# Altium PCB PCB-Thermostat.PcbDoc (part 1 of 5)
Units mm, origin at the board's own origin, x right, y up, seen from the top; angles counter-clockwise.
Board outline 100 x 90 mm, 4 copper layers (Top, PWR, GND, Bottom), stack 1.585 mm thick; 187 components, 164 nets, 696 pads, 417 vias.
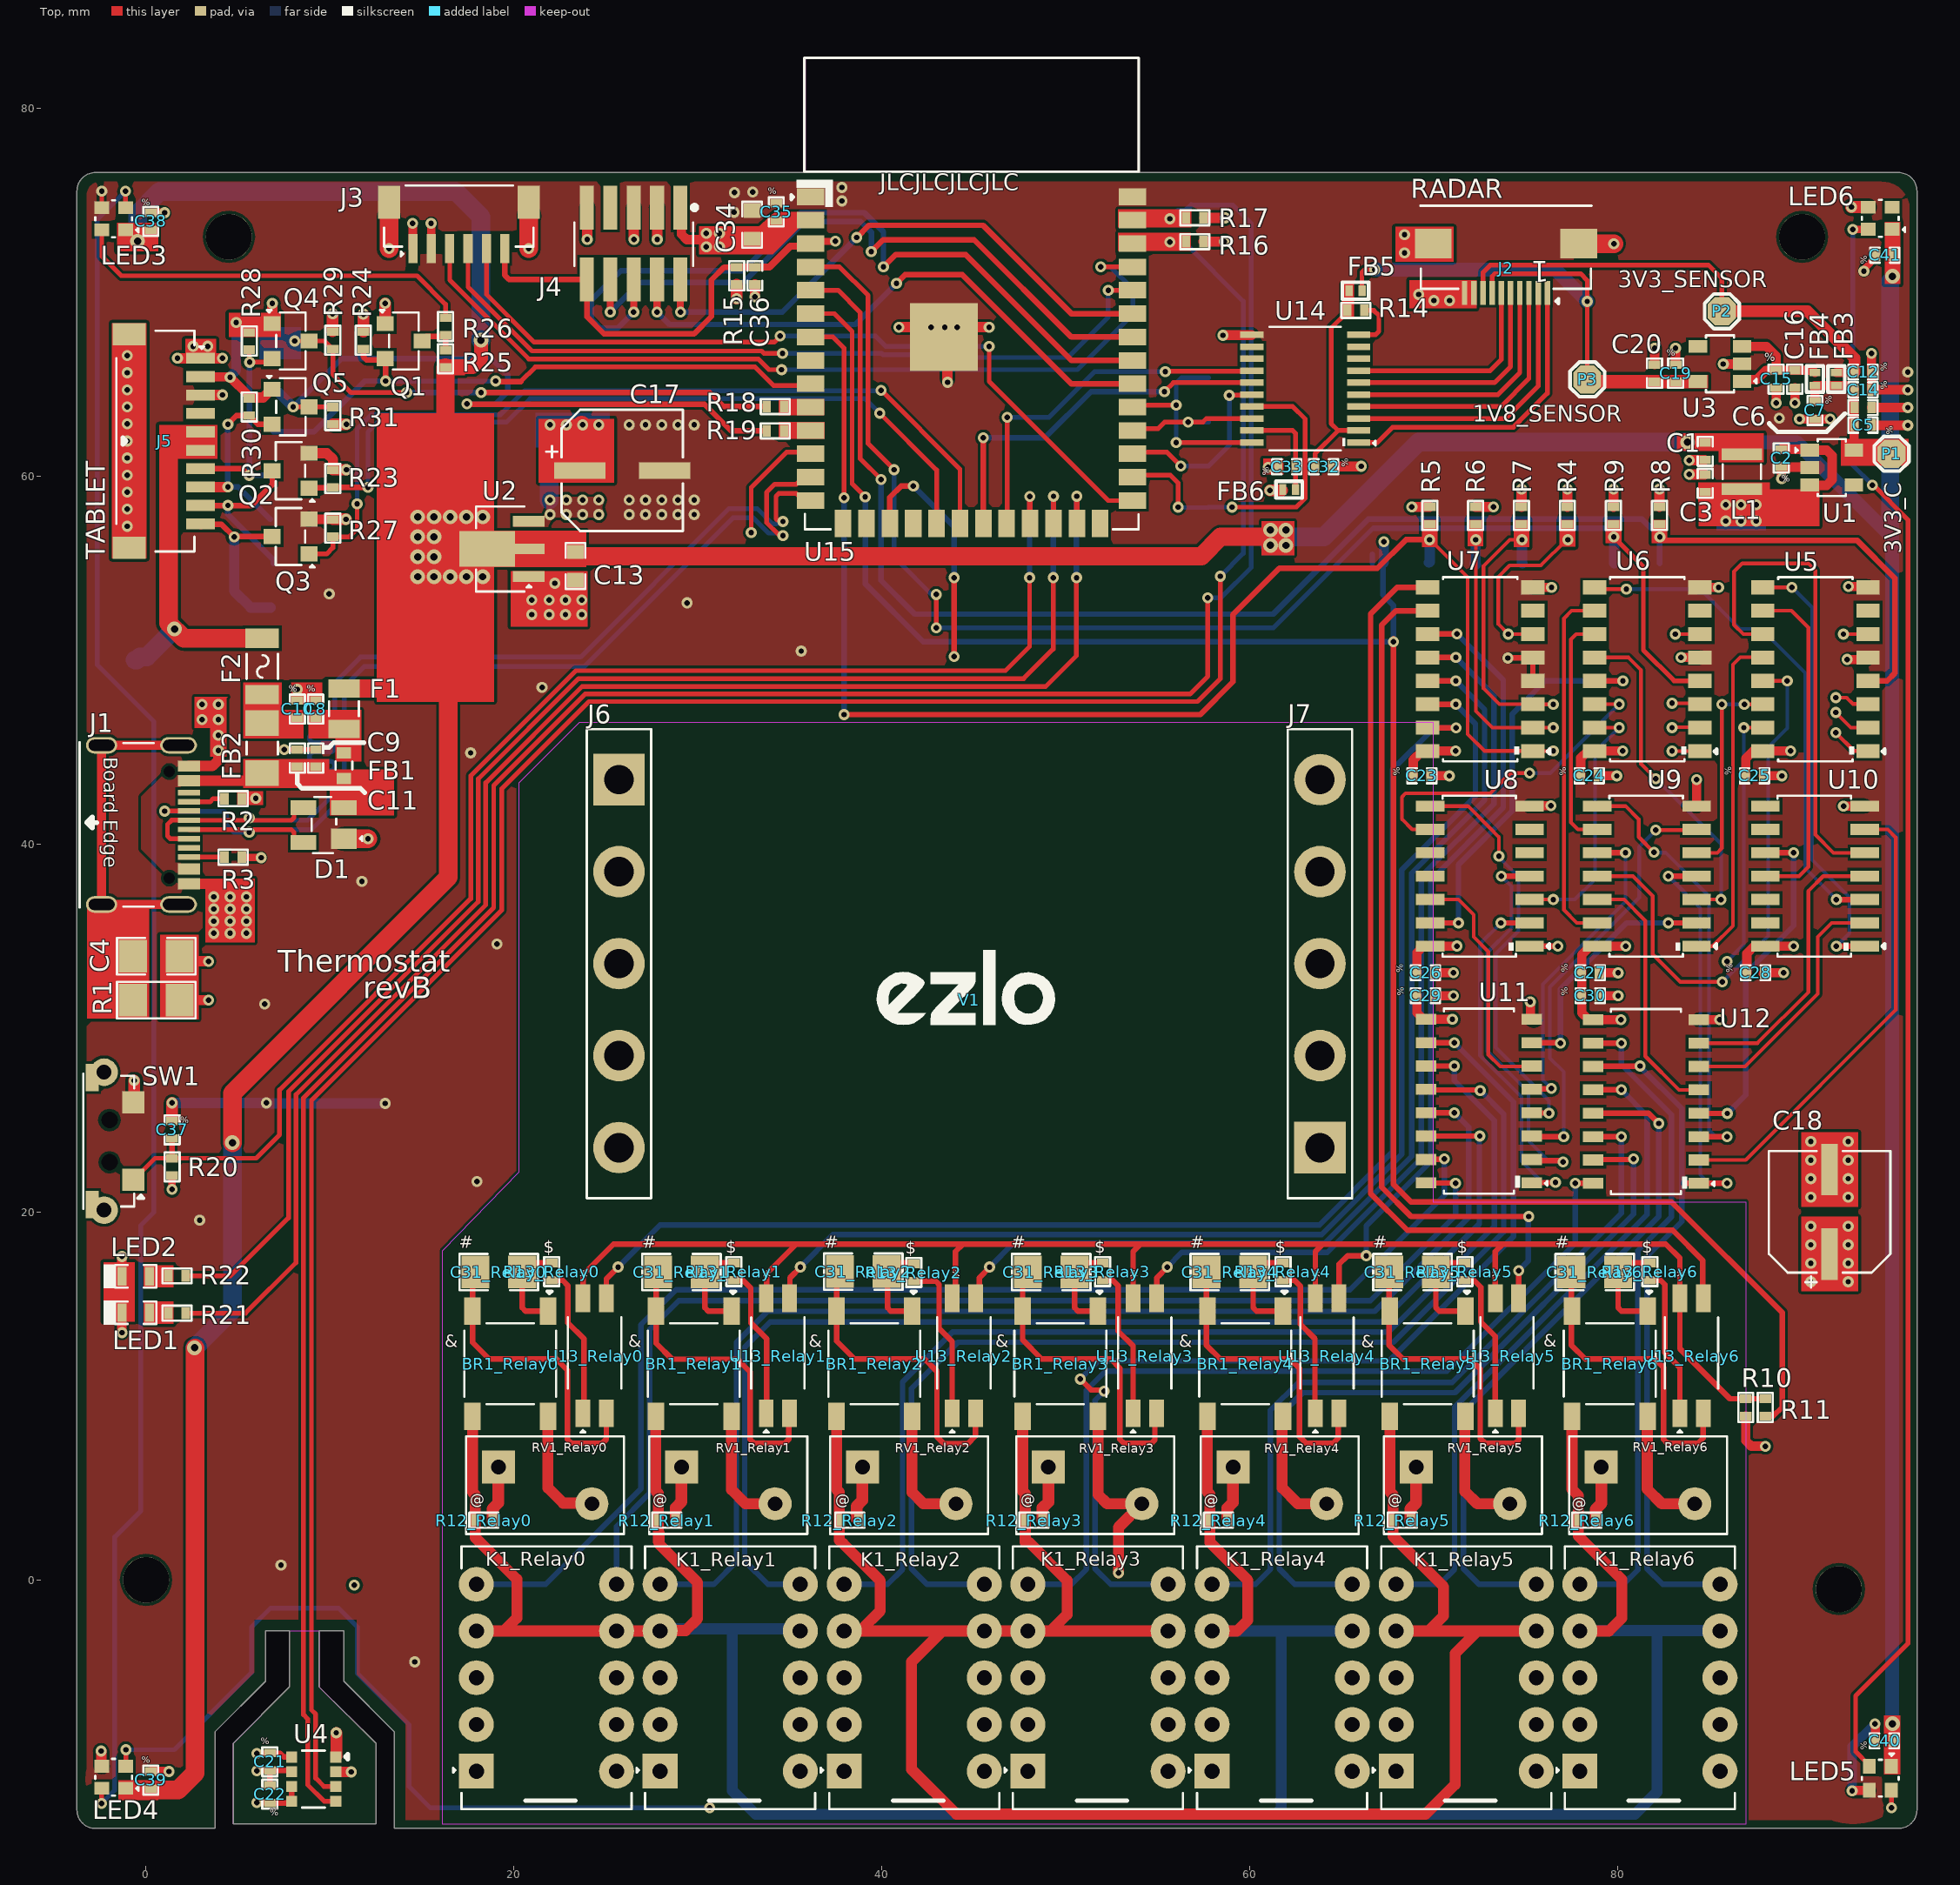
[diagram p0: Top view]
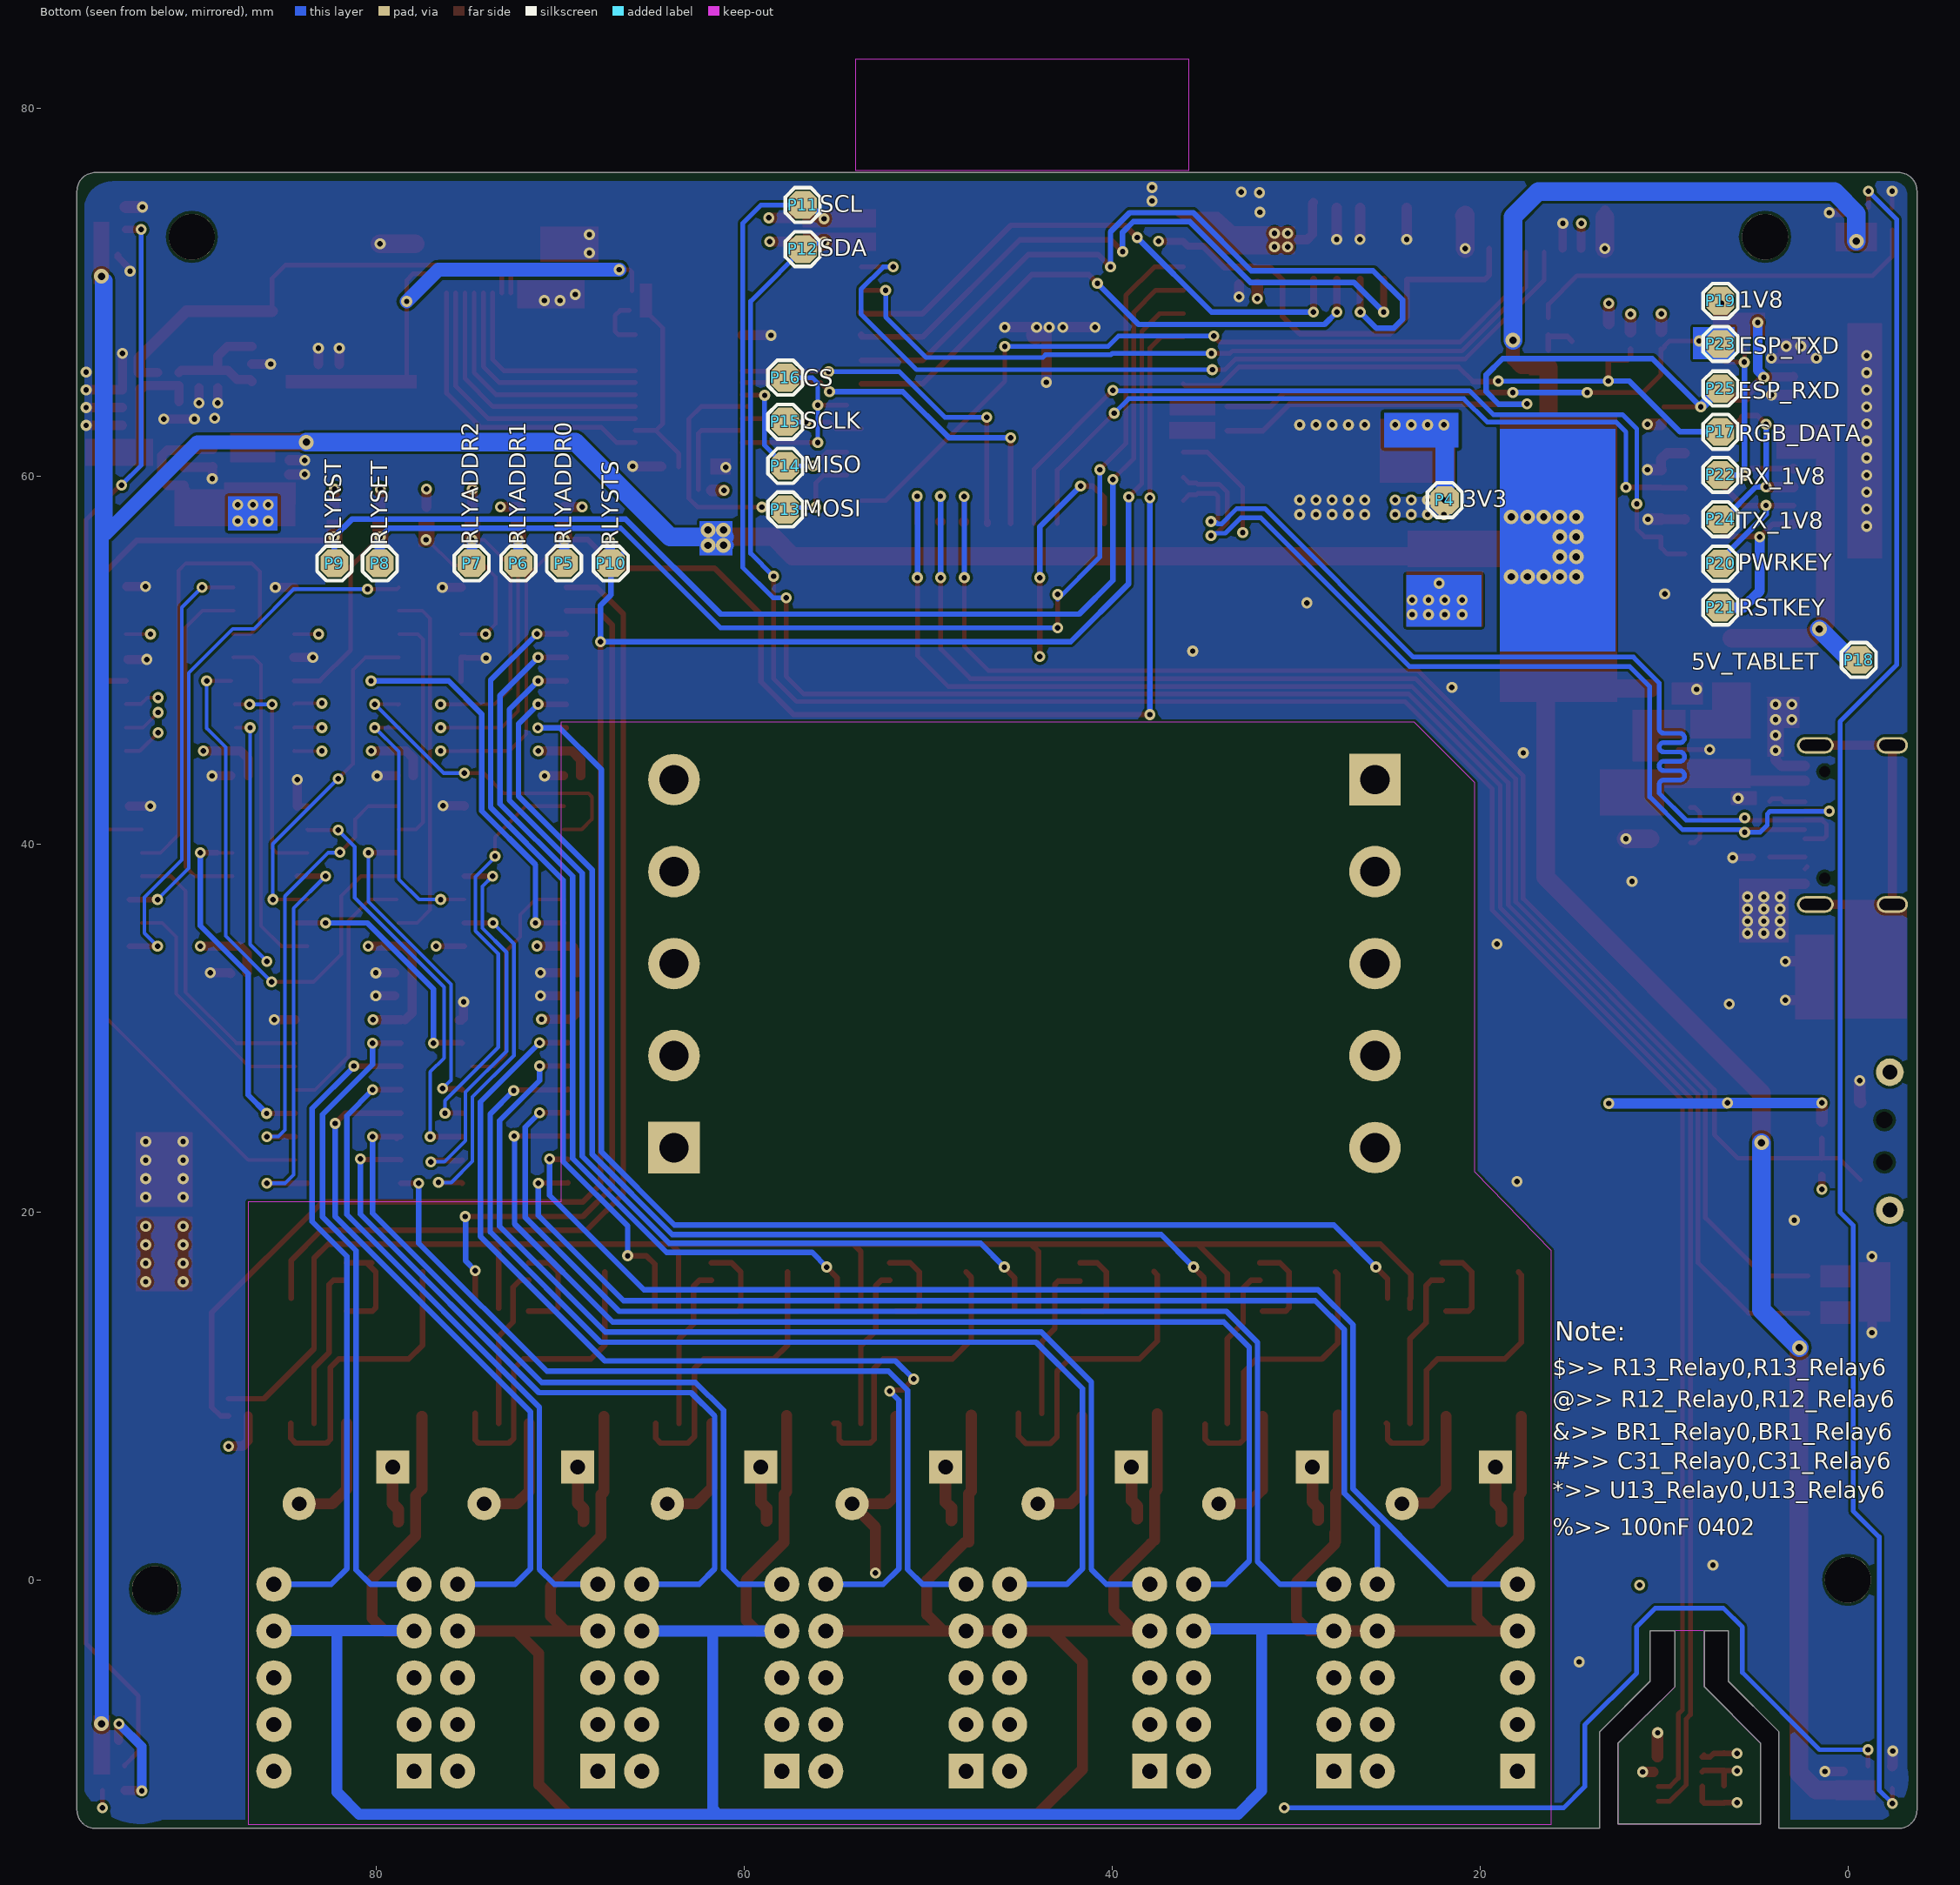
[diagram p1: Bottom view, seen from below]
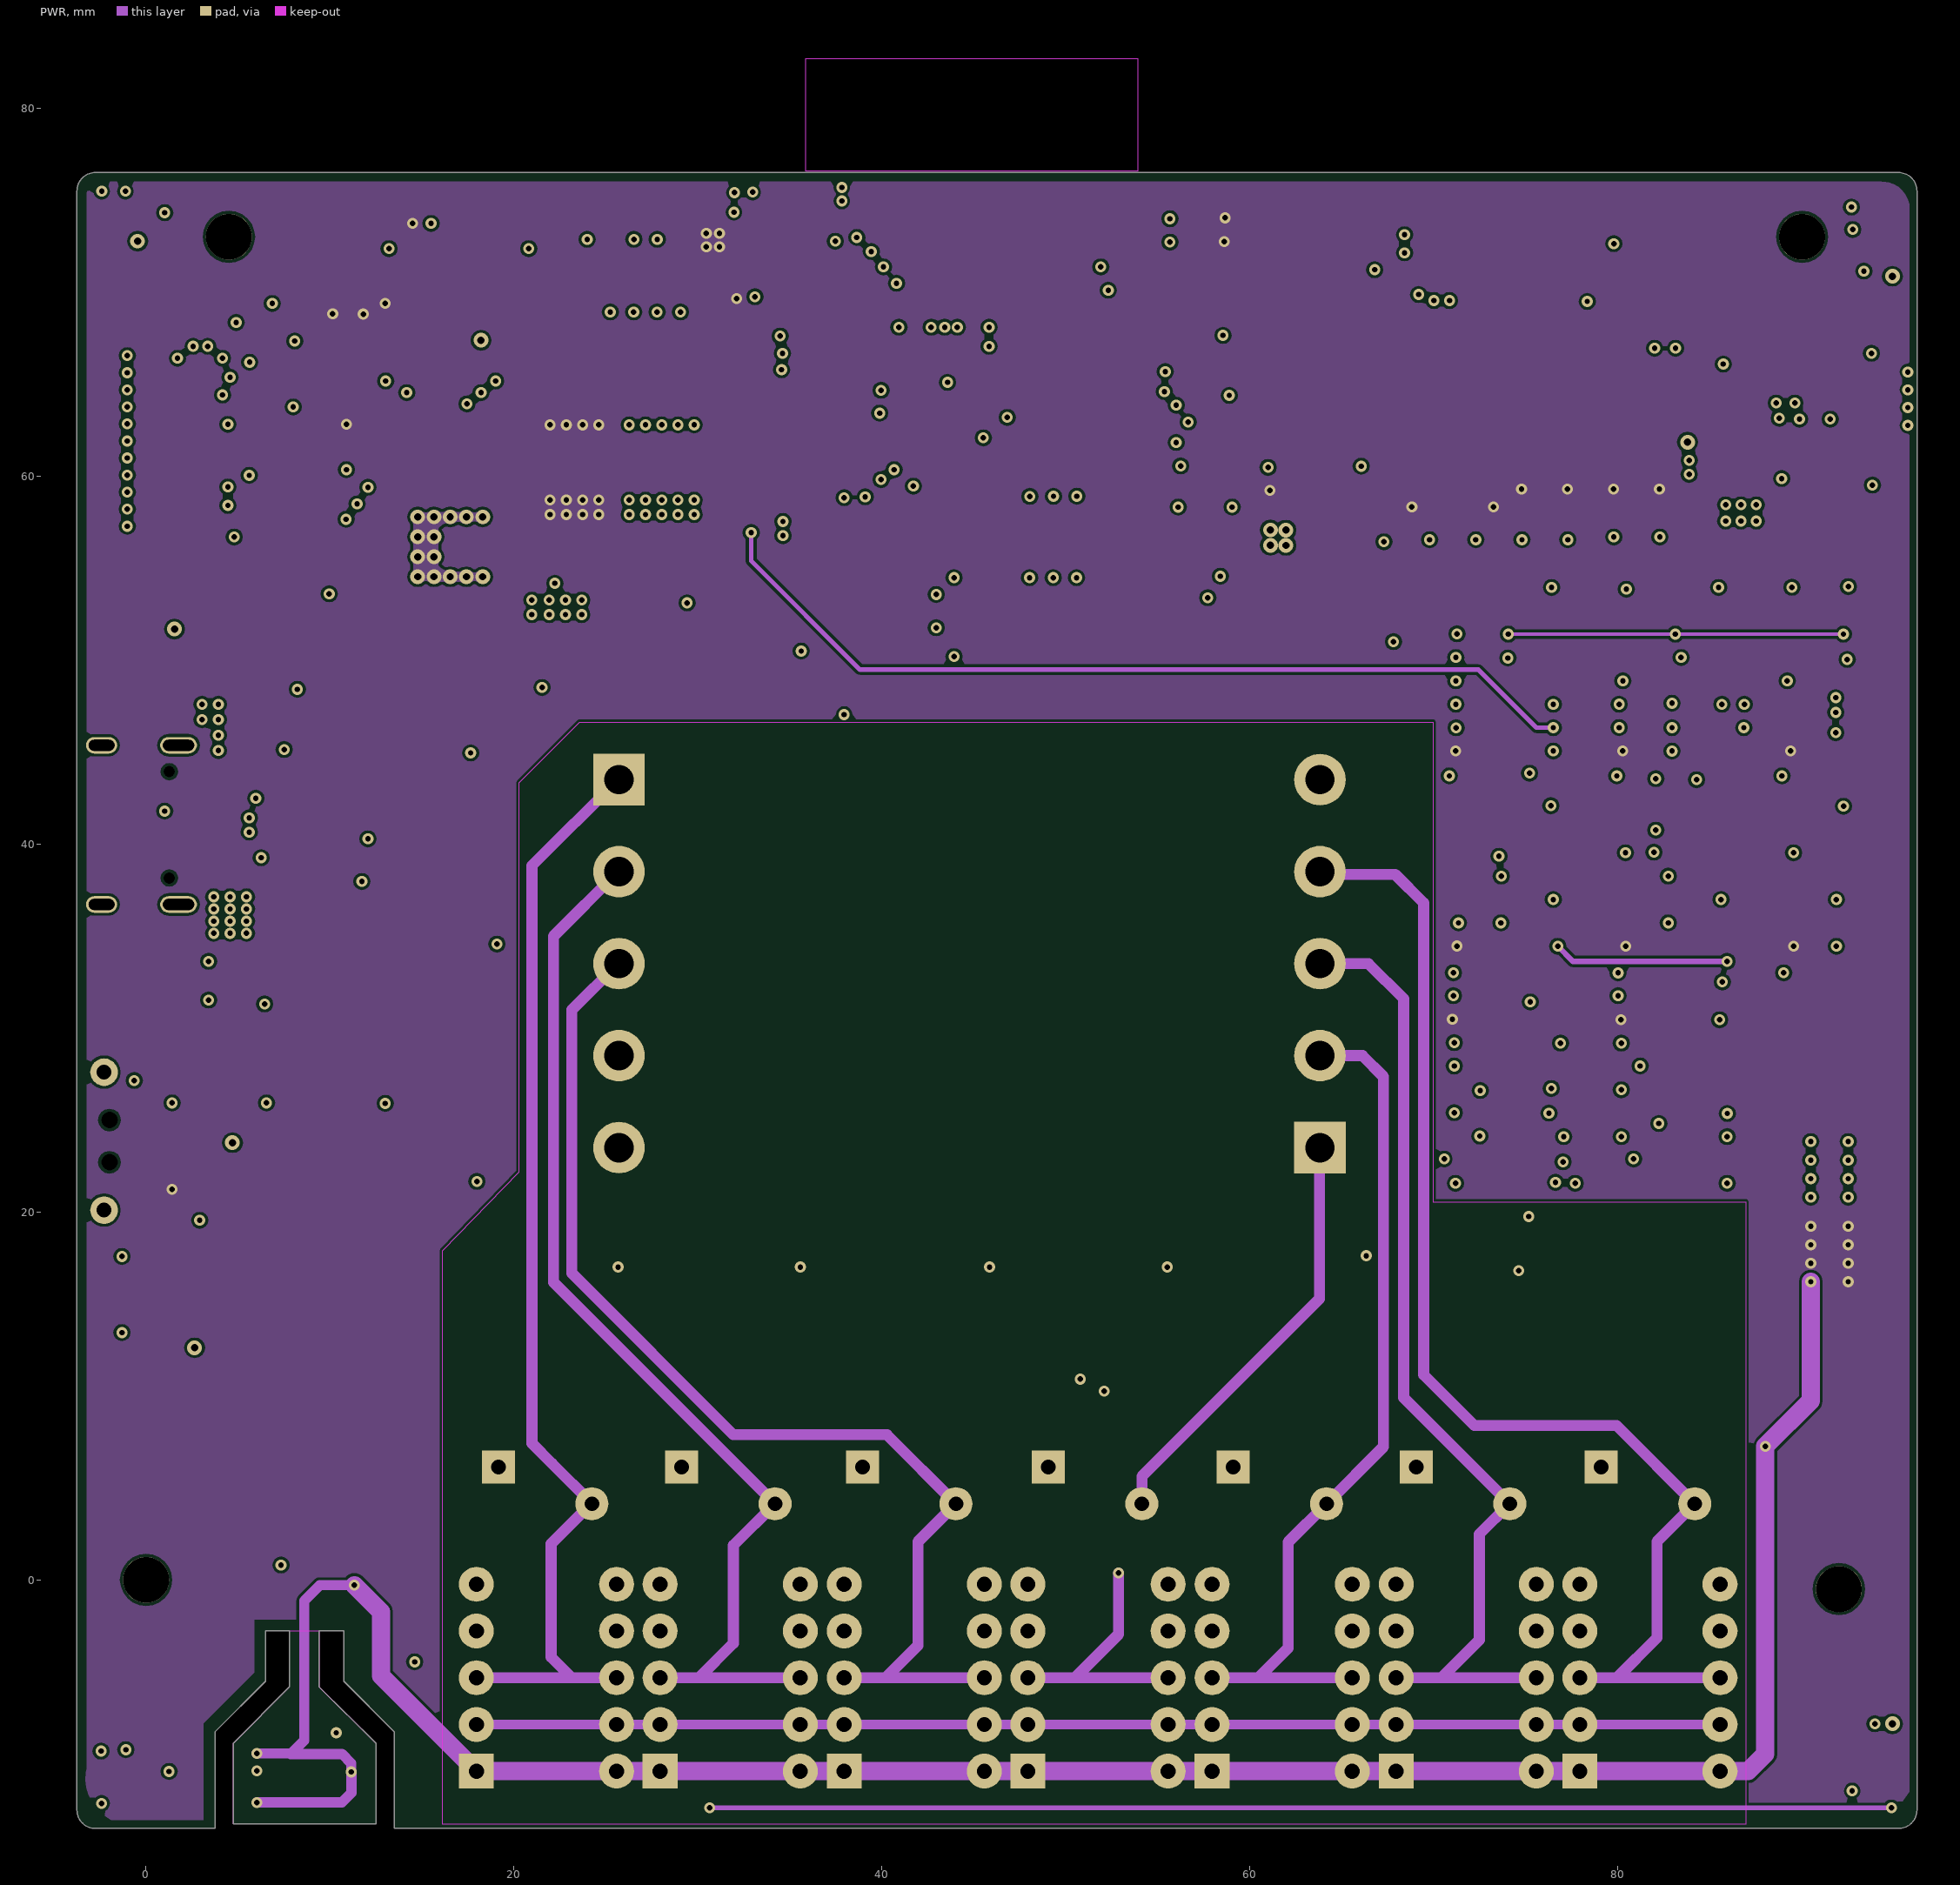
[diagram p2: PWR]
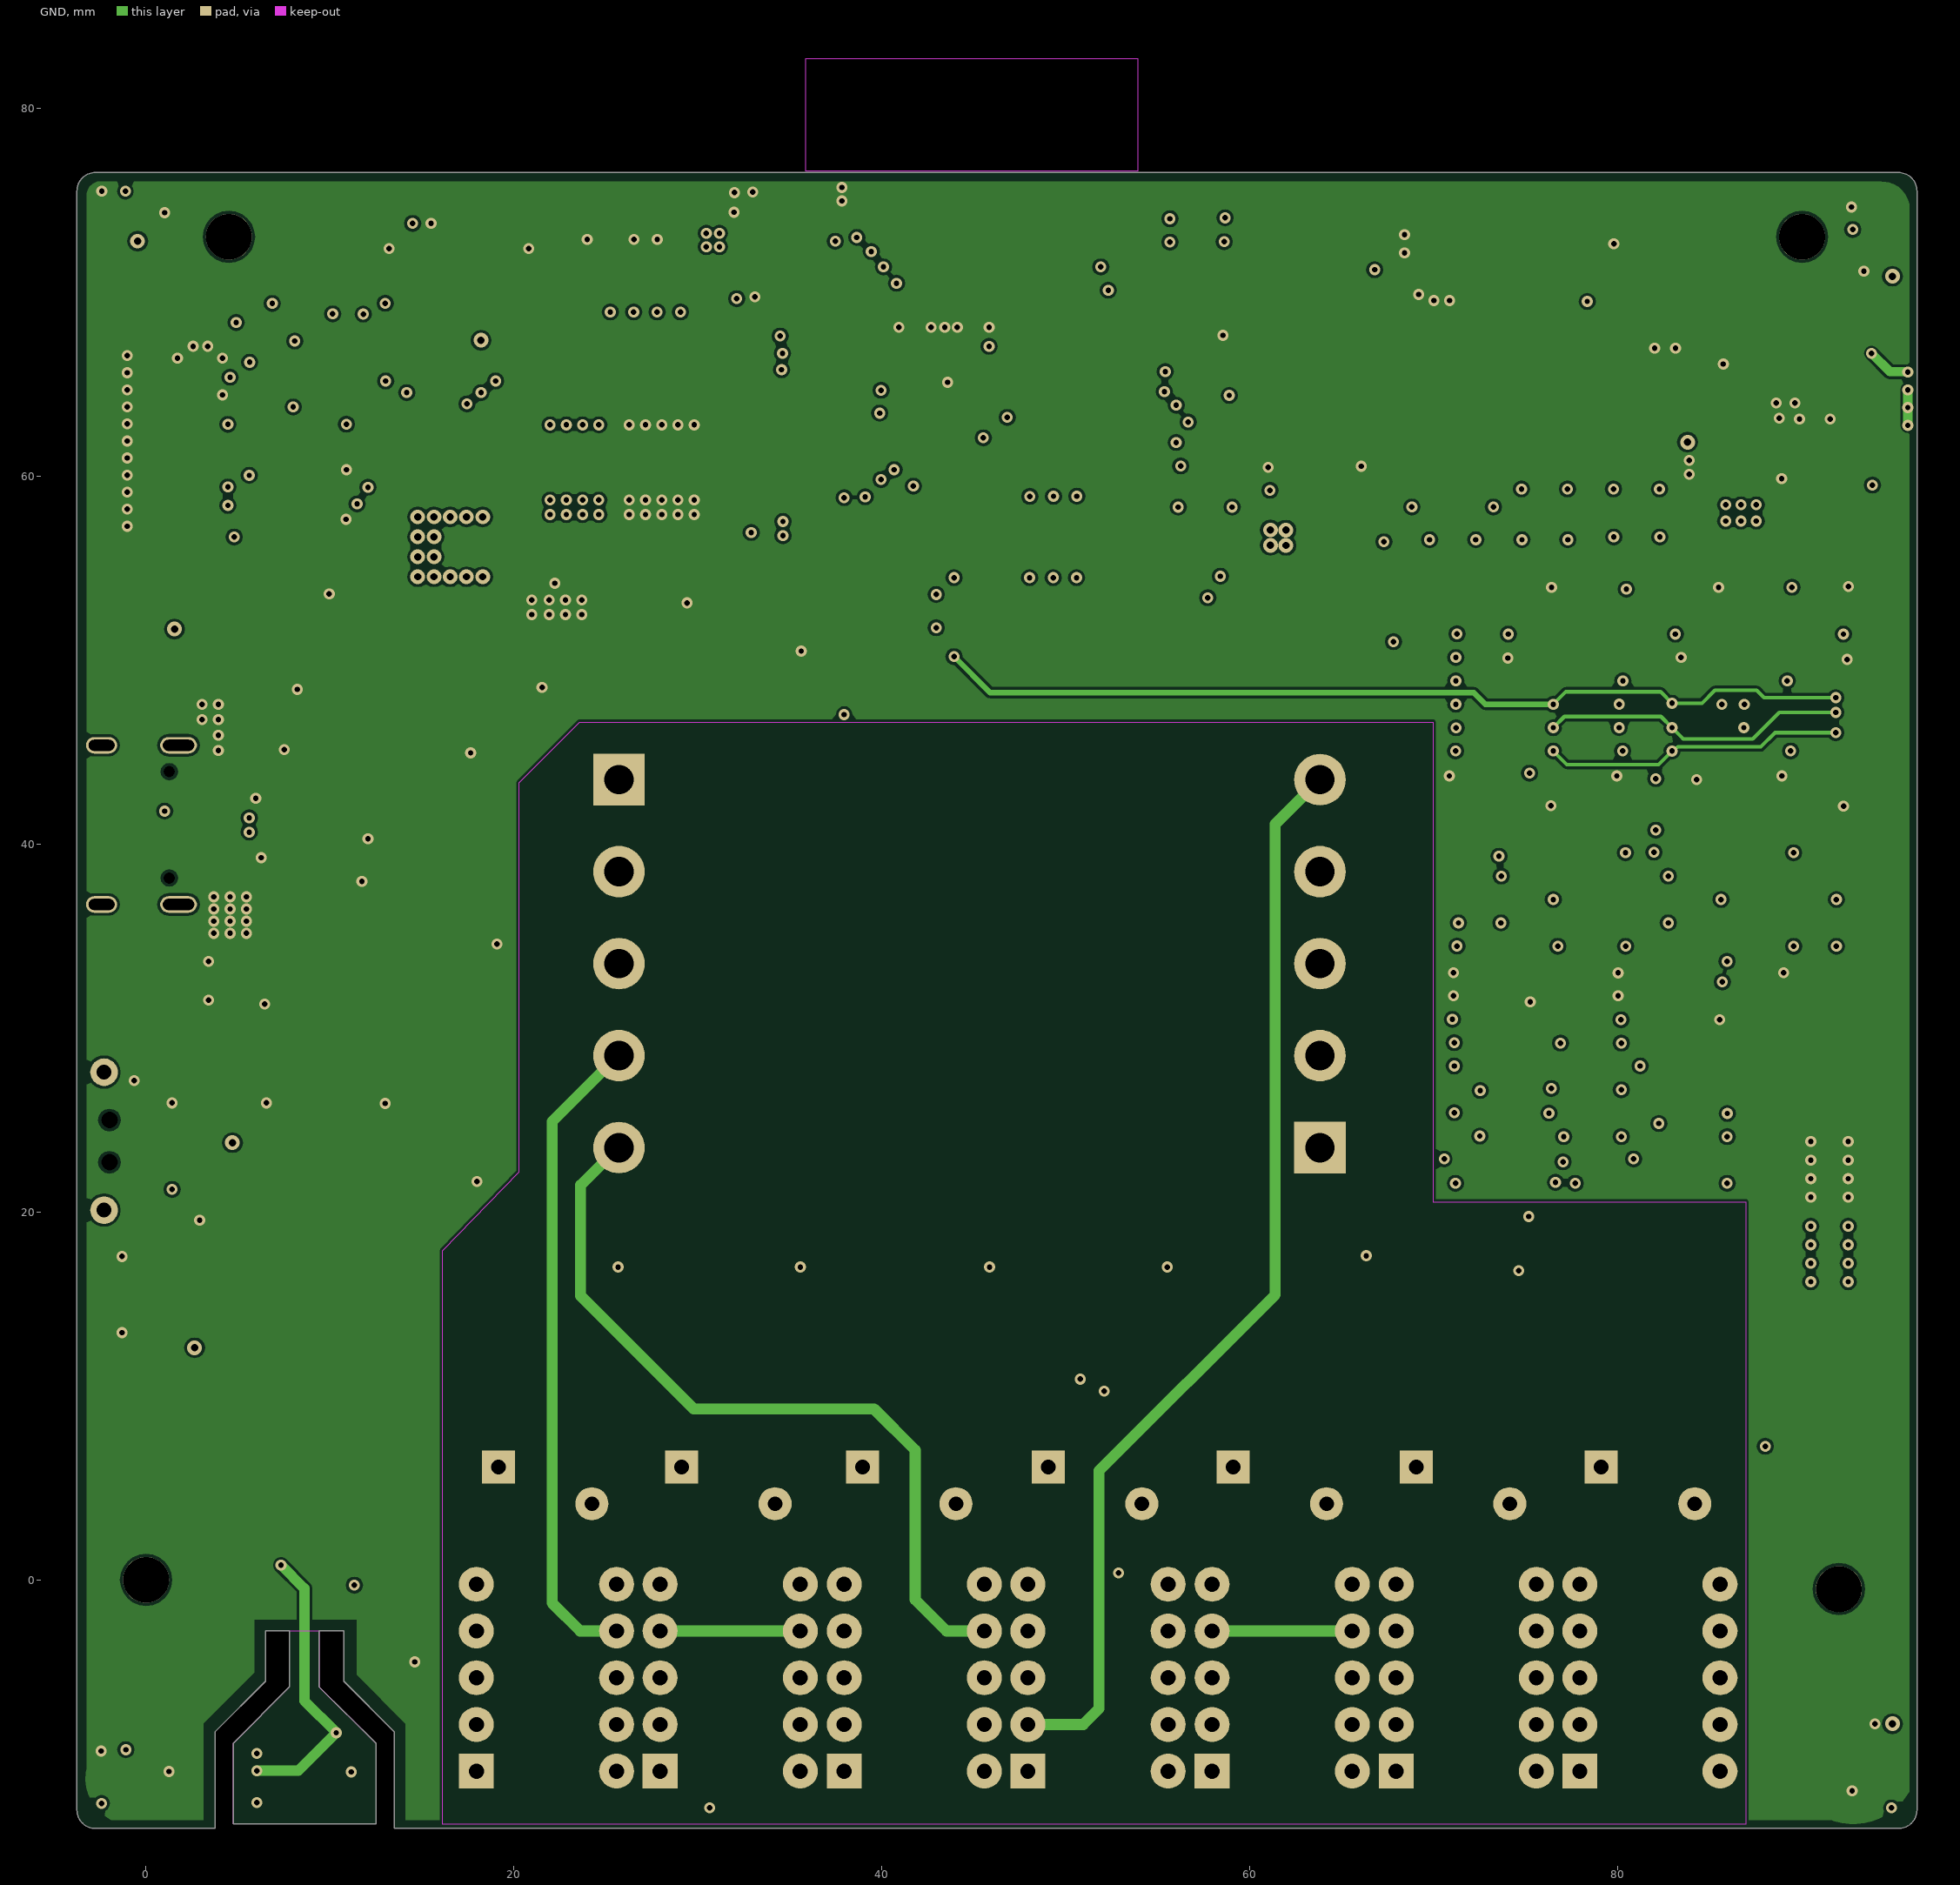
[diagram p3: GND]
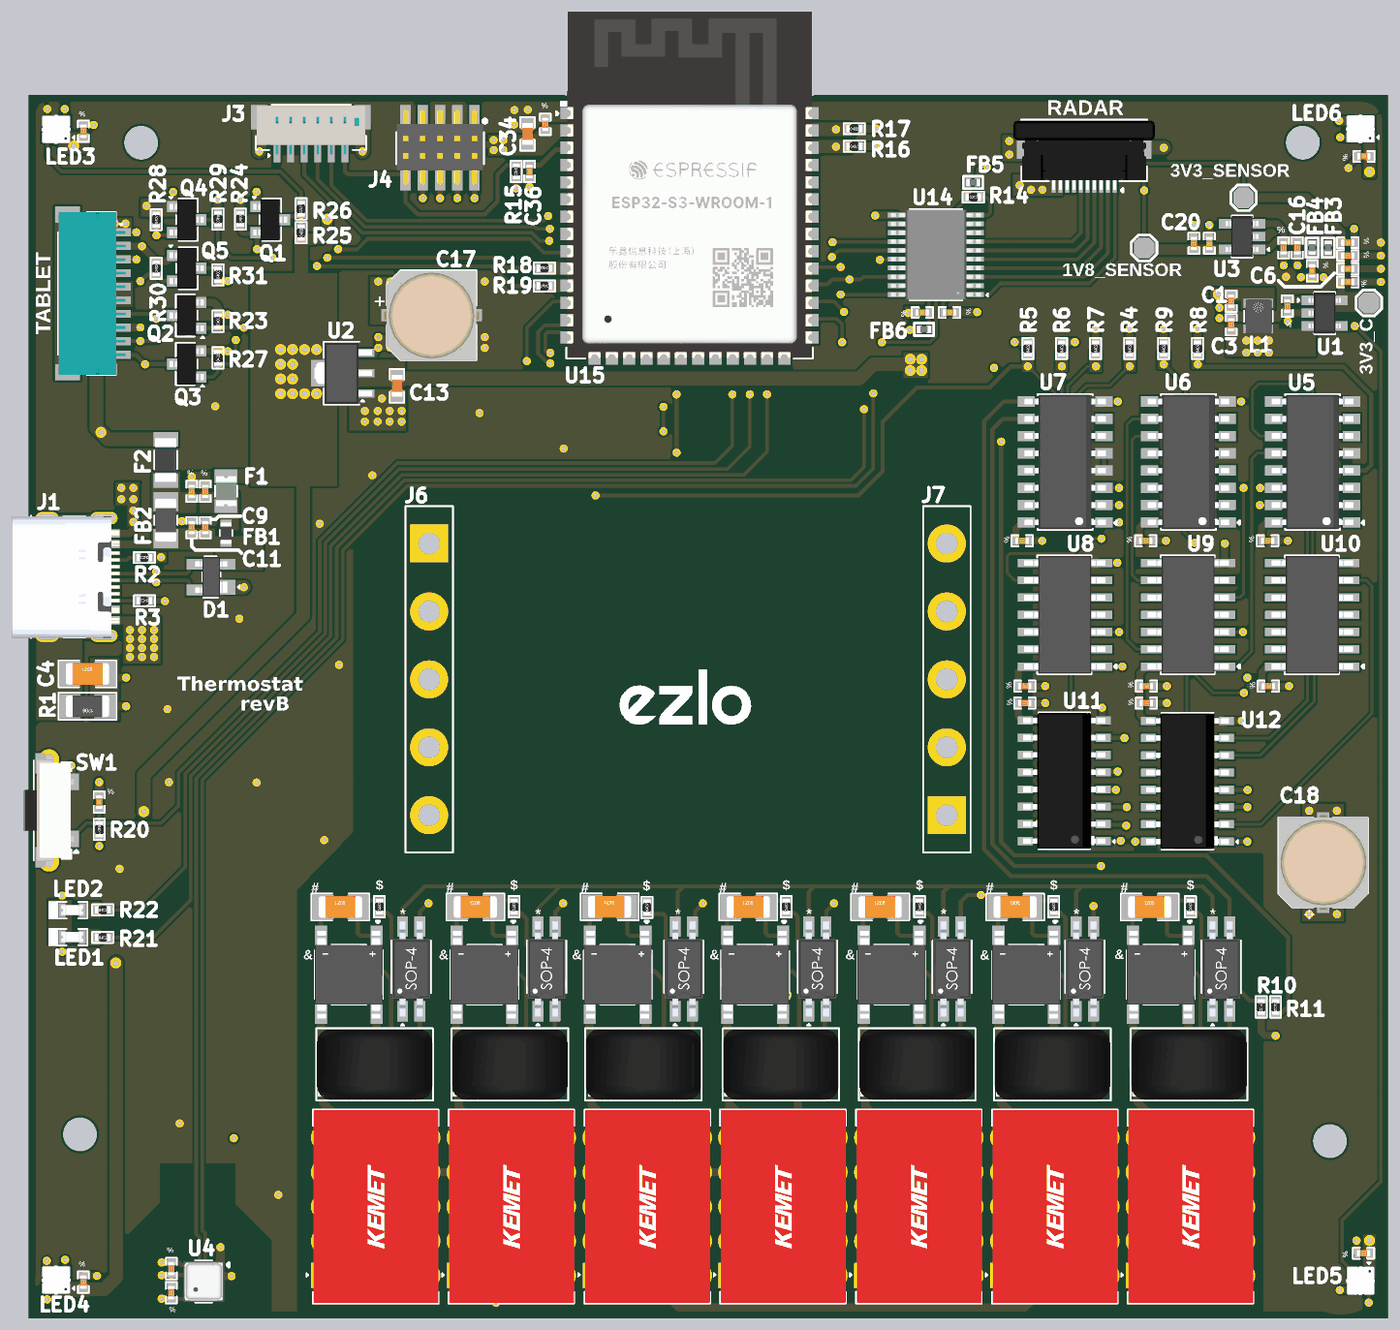
[diagram p6: 3D render of the assembled board from above, using the file's embedded part models]

## Layer stack, top to bottom
Top Solder: solder mask 0.0099, Solder Resist, Dk 3.5
Top: signal copper 0.0351
Dielectric 4: prepreg 0.2098, PP-006, Dk 4.1
PWR: signal copper 0.0152
Dielectric 1: core 1.065, FR-4, Dk 4.8
GND: signal copper 0.0152
Dielectric 5: prepreg 0.2098, PP-006, Dk 4.1
Bottom: signal copper 0.0351
Bottom Solder: solder mask 0.0099, Solder Resist, Dk 3.5

## Board outline
-3.75,-12.5 ccw(c-2.75,-12.5) -2.75,-13.5 3.75,-13.5 3.75,-8.25 6.5,-5.5 6.5,-2.75 7.8,-2.75 7.8,-5.8 4.75,-8.875 4.75,-13.25 12.5,-13.25 12.5,-8.875 9.4,-5.8 9.4,-2.75 10.75,-2.75 10.75,-5.5 13.5,-8.25 13.5,-13.5 95.25,-13.5 ccw(c95.25,-12.5) 96.25,-12.5 96.25,75.5 ccw(c95.25,75.5) 95.25,76.5 -2.75,76.5 ccw(c-2.75,75.5) -3.75,75.5

## Design rules (kind name [scope] priority, off if disabled: settings)
Clearance [All] p1: gap=0.152 ignorepadtopadclearanceinfootprint=FALSE except(0.102: Arc-SMDPad Track-SMDPad SMDPad-SMDPad)
DiffPairsRouting [All] p1: maxlimit=0.254 minlimit=0.254 mostfreqgap=0.254 toplayer_minwidth=0.254 toplayer_maxwidth=0.381 toplayer_prefwidth=0.381 midlayer1_minwidth=0.254 midlayer1_maxwidth=0.381 midlayer1_prefwidth=0.381 midlayer2_minwidth=0.254 midlayer2_maxwidth=0.381 midlayer2_prefwidth=0.381 bottomlayer_minwidth=0.254 bottomlayer_maxwidth=0.381 bottomlayer_prefwidth=0.381 maxuncoupledlength=12.7
HoleSize [All] p1: absolutevalues=TRUE maxlimit=25.4 minlimit=0.025 maxpercent=80.000 minpercent=20.000
HoleToHoleClearance [All] p1: gap=0 allowstackedmicrovias=TRUE
MatchedLengths [All] p1: tolerance=0.508 checknetsindiffpair=TRUE checkdiffpairvsdiffpair=FALSE checkxsignals=FALSE checkothers=FALSE
MaxMinImpedance [All] p1: minimum=85.00 maximum=90.00
MinimumSolderMaskSliver [All] p1: minsoldermaskwidth=0
PlaneConnect [All] p1: planeconnectstyle=Direct reliefexpansion=0.508 reliefentries=4 reliefconductorwidth=0.254 reliefairgap=0.254
PolygonConnect [All] p1: connectstyle=Direct reliefconductorwidth=0.254 reliefentries=4 polygonreliefangle="90 Angle" airgapwidth=0.254
RoutingVias [All] p1: holewidth=0.3 width=0.6 viastyle="Through Hole" minholewidth=0.3 minwidth=0.6 maxholewidth=0.4 maxwidth=0.8
SilkToSilkClearance [All] p1: silktosilkclearance=0
SilkToSolderMaskClearance [IsPad] p1: minsilkscreentomaskgap=0 clearancetoexposedcopper=TRUE
SolderMaskExpansion [All] p1: expansion=0 istentingtop=FALSE soldermaskfromhole=TRUE
Width [All] p1: maxlimit=1.27 minlimit=0.2 preferedwidth=0.559 midlayer1_maxwidth=1.016 midlayer2_maxwidth=1.016 minimp=50.000000 maximp=50.000000 favimp=50.000000
23 further rules are at their usual default settings.

## Classes and differential pairs
differential pair class USB_Lines: USB
net class USB: USB_N USB_P
channel class Relay-Sheet: Relay0 Relay1 Relay2 Relay3 Relay4 Relay5 Relay6
component class U_Sensor-Sheet: C21 C22 J2 U4
component class U_Power-Sheet: C1 C2 C3 C4 C5 C6 C7 C8 C9 C10 C11 C12 C13 C14 C15 C16 C17 C18 C19 C20 D1 F1 F2 FB1 FB2 FB3 FB4 J1 L1 P1 P2 P3 P4 R1 R2 R3 U1 U2 U3
component class U_Output-Sheet: C23 C24 C25 C26 C27 C28 C29 C30 P5 P6 P7 P8 P9 P10 R4 R5 R6 R7 R8 R9 R10 R11 U5 U6 U7 U8 U9 U10 U11 U12
component class U_Output-Connection-Sheet: J6 J7
component class U_Miscellaneous-Sheet: C38 C39 C40 C41 J5 LED3 LED4 LED5 LED6 P17 P18 P19 P20 P21 P22 P23 P24 P25 Q1 Q2 Q3 Q4 Q5 R23 R24 R25 R26 R27 R28 R29 R30 R31
component class U_Level-Shifter-Sheet: C32 C33 FB5 FB6 R14 U14
component class U_ESP32-Sheet: C34 C35 C36 C37 J3 J4 LED1 LED2 P11 P12 P13 P14 P15 P16 R15 R16 R17 R18 R19 R20 R21 R22 SW1 U15
component class Relay6: BR1_Relay6 C31_Relay6 K1_Relay6 R12_Relay6 R13_Relay6 RV1_Relay6 U13_Relay6
component class Relay5: BR1_Relay5 C31_Relay5 K1_Relay5 R12_Relay5 R13_Relay5 RV1_Relay5 U13_Relay5
component class Relay4: BR1_Relay4 C31_Relay4 K1_Relay4 R12_Relay4 R13_Relay4 RV1_Relay4 U13_Relay4
component class Relay3: BR1_Relay3 C31_Relay3 K1_Relay3 R12_Relay3 R13_Relay3 RV1_Relay3 U13_Relay3
component class Relay2: BR1_Relay2 C31_Relay2 K1_Relay2 R12_Relay2 R13_Relay2 RV1_Relay2 U13_Relay2
component class Relay1: BR1_Relay1 C31_Relay1 K1_Relay1 R12_Relay1 R13_Relay1 RV1_Relay1 S U13_Relay1
component class Relay0: BR1_Relay0 C31_Relay0 K1_Relay0 R12_Relay0 R13_Relay0 RV1_Relay0 U13_Relay0
differential pair USB: +USB_P -USB_N

## Components (designator, comment, footprint, x,y, rotation, side; value= is the part's Value field where it differs from the comment)
BR1_Relay0 "ABS10" ABS 19.797,11.763 r270 top (schematic designator BR1)
BR1_Relay1 "ABS10" ABS 29.772,11.763 r270 top (schematic designator BR1)
BR1_Relay2 "ABS10" ABS 39.583,11.763 r270 top (schematic designator BR1)
BR1_Relay3 "ABS10" ABS 49.693,11.763 r270 top (schematic designator BR1)
BR1_Relay4 "ABS10" ABS 59.744,11.763 r270 top (schematic designator BR1)
BR1_Relay5 "ABS10" ABS 69.657,11.763 r270 top (schematic designator BR1)
BR1_Relay6 "ABS10" ABS 79.556,11.763 r270 top (schematic designator BR1)
C1 "10uF" Cap-0402 84.736,61.35 r90 top locked
C2 "100nF" Cap-0402 88.875,60.985 r270 top
C3 "10uF" Cap-0402 84.736,59.61 r270 top
C4 "4.7nF" Cap-1206 0.559,33.909 r0 top locked
C5 "100nF" Cap-0402 93.32,62.763 r0 top locked
C6 "10uF" Cap-0402 93.32,63.729 r180 top locked
C7 "100nF" Cap-0402 90.703,63.576 r270 top locked
C8 "100nF" Cap-0402 9.23,47.341 r90 top locked
C9 "0.01uF" Cap-0402 9.23,44.674 r90 top locked
C10 "100nF" Cap-0402 8.23,47.341 r90 top locked
C11 "0.01uF" Cap-0402 8.23,44.674 r90 top locked
C12 "100nF" Cap-0402 93.32,65.659 r0 top
C13 "10uF" Cap-0603 23.343,55.118 r270 top locked
C14 "100nF" Cap-0402 93.32,64.694 r0 top locked
C15 "100nF" Cap-0402 88.595,65.278 r270 top
C16 "10uF" Cap-0402 89.606,65.278 r90 top
C17 "100uF" UCD1A101MCL1GS 25.883,60.312 r0 top locked
C18 "100uF" UCD1A101MCL1GS 91.506,20.012 r90 top locked
C19 "100nF" Cap-0402 83.131,65.595 r90 top locked
C20 "10uF" Cap-0402 81.991,65.595 r270 top locked
C21 "100nF" Cap-0402 6.731,-9.876 r270 top locked
C22 "100nF" Cap-0402 6.731,-11.646 r90 top locked
C23 "100nF" Cap-0402 69.344,43.709 r0 top locked
C24 "100nF" Cap-0402 78.444,43.709 r0 top locked
C25 "100nF" Cap-0402 87.419,43.709 r0 top locked
C26 "100nF" Cap-0402 69.544,33.009 r0 top locked
C27 "100nF" Cap-0402 78.494,33.009 r0 top locked
C28 "100nF" Cap-0402 87.474,33.009 r0 top locked
C29 "100nF" Cap-0402 69.544,31.759 r0 top locked
C30 "100nF" Cap-0402 78.494,31.759 r0 top locked
C31_Relay0 "220nF" Cap-1206 19.177,16.739 r0 top locked (schematic designator C31)
C31_Relay1 "220nF" Cap-1206 29.108,16.739 r0 top locked (schematic designator C31)
C31_Relay2 "220nF" Cap-1206 38.989,16.764 r0 top (schematic designator C31)
C31_Relay3 "220nF" Cap-1206 49.2,16.739 r0 top locked (schematic designator C31)
C31_Relay4 "220nF" Cap-1206 58.903,16.739 r0 top locked (schematic designator C31)
C31_Relay5 "220nF" Cap-1206 68.834,16.739 r0 top locked (schematic designator C31)
C31_Relay6 "220nF" Cap-1206 78.74,16.739 r0 top locked (schematic designator C31)
C32 "100nF" Cap-0402 64.006,60.512 r180 top locked
C33 "100nF" Cap-0402 62.003,60.512 r180 top locked
C34 "22uF" Cap-0603 32.945,73.663 r90 top locked
C35 "100nF" Cap-0402 34.253,74.362 r90 top locked
C36 "1uF" Cap-0402 33.096,70.891 r90 top locked
C37 "100nF" Cap-0402 1.422,24.473 r90 top locked
C38 "100nF" Cap-0402 0.256,73.852 r90 top locked
C39 "100nF" Cap-0402 0.256,-10.874 r90 top locked
C40 "100nF" Cap-0402 94.476,-8.741 r180 top locked
C41 "100nF" Cap-0402 94.503,72.009 r180 top locked
D1 "SP0503BAHTG" SOT-143-4_ 10.76,40.286 r180 top locked
F1 "JK-SMD0805-100" Fuse-0805 10.756,47.359 r90 top locked
F2 "SMD1206K200SF6V" "Fuse 1206 (3216 Metric)" 6.322,49.655 r90 top locked
FB1 "BLM18SG121TN1D" "IND-0603 (1608 Metric)" 10.756,44.262 r90 top locked
FB2 "100MHz" IND-1206 6.322,45.223 r90 top locked
FB3 "100MHz" IND-0402 91.872,65.278 r90 top locked
FB4 "100MHz" IND-0402 90.703,65.278 r90 top locked
FB5 "100MHz" IND-0402 65.735,70.079 r180 top locked
FB6 "100MHz" IND-0402 62.131,59.269 r180 top locked
J1 "TYPE-C-31-M-12" TYPE-C-31-M-12_ 2.34,44.246 r270 top locked
J2 "AFC01-S10FCC-00" AFC01-S10FCC-00 73.914,71.298 r180 top locked
J3 "Voltlink Target" "Voltlink Target" 17.005,73.631 r0 top locked
J4 "20021121-00010C4LF" 20021121-00010C4LF_ 26.506,72.644 r180 top locked
J5 "SM10B-SRSS-TB(LF)(SN)" SM10B-SRSS-TB(LF)(SN) 1.024,61.909 r270 top locked
J6 "Clamp-Terminal-A" Clamp-Terminal-A 25.705,43.503 r270 top locked
J7 "Clamp-Terminal-B" Clamp-Terminal-B. 63.805,33.503 r90 top locked
K1_Relay0 "EA2-3TNU" EA2-3TNU 21.768,-5.309 r180 top (schematic designator K1)
K1_Relay1 "EA2-3TNU" EA2-3TNU 31.75,-5.309 r180 top (schematic designator K1)
K1_Relay2 "EA2-3TNU" EA2-3TNU 41.758,-5.309 r180 top (schematic designator K1)
K1_Relay3 "EA2-3TNU" EA2-3TNU 51.74,-5.309 r180 top (schematic designator K1)
K1_Relay4 "EA2-3TNU" EA2-3TNU 61.747,-5.309 r180 top (schematic designator K1)
K1_Relay5 "EA2-3TNU" EA2-3TNU 71.755,-5.309 r180 top (schematic designator K1)
K1_Relay6 "EA2-3TNU" EA2-3TNU 81.737,-5.309 r180 top (schematic designator K1)
L1 "10uH" "IND-1008 (2520 Metric)" 86.736,60.242 r270 top locked
LED1 "Transparent" LED-0603 -0.559,14.529 r180 top locked
LED2 "Yellow" LED-0603 -0.559,16.51 r180 top locked
LED3 "SK6812-EC20" SK6812-EC20 -1.753,73.99 r0 top locked
LED4 "SK6812-EC20" SK6812-EC20 -1.753,-10.719 r0 top locked
LED5 "SK6812-EC20" SK6812-EC20 94.259,-10.77 r90 top locked
LED6 "SK6812-EC20" SK6812-EC20 94.259,74.016 r0 top locked
P1 "TEST POINT" Test-point 94.869,61.214 r0 top locked
P2 "TEST POINT" Test-point 85.649,68.961 r0 top locked
P3 "TEST POINT" Test-point 78.332,65.259 r0 top locked
P4 "TEST POINT" Test-point 21.914,58.699 r180 bottom locked
P5 "TEST POINT" Test-point 69.774,55.265 r180 bottom locked
P6 "TEST POINT" Test-point 72.263,55.265 r180 bottom locked
P7 "TEST POINT" Test-point 74.803,55.265 r180 bottom locked
P8 "TEST POINT" Test-point 79.792,55.265 r180 bottom locked
P9 "TEST POINT" Test-point 82.256,55.265 r180 bottom locked
P10 "TEST POINT" Test-point 67.234,55.265 r180 bottom locked
P11 "TEST POINT" Test-point 56.807,74.741 r90 bottom locked
P12 "TEST POINT" Test-point 56.807,72.339 r90 bottom locked
P13 "TEST POINT" Test-point 57.76,58.191 r0 bottom locked
P14 "TEST POINT" Test-point 57.76,60.562 r0 bottom locked
P15 "TEST POINT" Test-point 57.76,62.958 r0 bottom locked
P16 "TEST POINT" Test-point 57.76,65.354 r0 bottom locked
P17 "TEST POINT" Test-point 6.934,62.408 r270 bottom locked
P18 "TEST POINT" Test-point -0.584,50.013 r180 bottom locked
P19 "TEST POINT" Test-point 6.934,69.53 r180 bottom locked
P20 "TEST POINT" Test-point 6.934,55.245 r180 bottom locked
P21 "TEST POINT" Test-point 6.934,52.857 r180 bottom locked
P22 "TEST POINT" Test-point 6.934,60.071 r180 bottom locked
P23 "TEST POINT" Test-point 6.934,67.183 r180 bottom locked
P24 "TEST POINT" Test-point 6.934,57.658 r180 bottom locked
P25 "TEST POINT" Test-point 6.934,64.76 r180 bottom locked
Q1 "Si2302CDS" Sot-23 14.005,67.346 r270 top locked
Q2 "Si2302CDS" Sot-23 7.865,60.295 r90 top locked
Q3 "Si2302CDS" Sot-23 7.865,56.718 r90 top locked
Q4 "Si2302CDS" Sot-23 7.865,67.346 r270 top locked
Q5 "Si2302CDS" Sot-23 7.865,63.769 r270 top locked
R1 "1M" Res-1206 0.559,31.521 r180 top locked
R2 "5.1K" Res-0402 4.737,42.469 r180 top locked
R3 "5.1K" Res-0402 4.737,39.294 r180 top locked
R4 "220K" Res-0402 77.256,57.857 r90 top locked
R5 "220K" Res-0402 69.774,57.857 r90 top locked
R6 "220K" Res-0402 72.256,57.857 r90 top locked
R7 "220K" Res-0402 74.756,57.857 r90 top locked
R8 "220K" Res-0402 82.256,57.857 r90 top locked
R9 "220K" Res-0402 79.756,57.857 r90 top locked
R10 "220K" Res-0402 86.944,9.383 r270 top locked
R11 "47K" Res-0402 88.006,9.383 r270 top locked
R12_Relay0 "47R" Res-0402 18.364,3.251 r180 top (schematic designator R12)
R12_Relay1 "47R" Res-0402 28.296,3.251 r180 top (schematic designator R12)
R12_Relay2 "47R" Res-0402 38.252,3.251 r180 top (schematic designator R12)
R12_Relay3 "47R" Res-0402 48.26,3.251 r180 top (schematic designator R12)
R12_Relay4 "47R" Res-0402 58.293,3.251 r180 top (schematic designator R12)
R12_Relay5 "47R" Res-0402 68.275,3.251 r180 top (schematic designator R12)
R12_Relay6 "47R" Res-0402 78.308,3.251 r180 top (schematic designator R12)
R13_Relay0 "100K" Res-0402 22.047,16.764 r90 top locked (schematic designator R13)
R13_Relay1 "100K" Res-0402 31.953,16.764 r90 top locked (schematic designator R13)
R13_Relay2 "100K" Res-0402 41.732,16.713 r90 top (schematic designator R13)
R13_Relay3 "100K" Res-0402 51.994,16.764 r90 top locked (schematic designator R13)
R13_Relay4 "100K" Res-0402 61.798,16.764 r90 top locked (schematic designator R13)
R13_Relay5 "100K" Res-0402 71.679,16.764 r90 top locked (schematic designator R13)
R13_Relay6 "100K" Res-0402 81.737,16.764 r90 top locked (schematic designator R13)
R14 "0R" Res-0402 65.756,69.006 r180 top locked
R15 "220K" Res-0402 32.106,70.891 r270 top locked
R16 "4.7K" Res-0402 56.998,72.746 r0 top locked
R17 "4.7K" Res-0402 56.998,74.041 r0 top locked
R18 "22R" Res-0402 34.201,63.779 r180 top locked
R19 "22R" Res-0402 34.201,62.459 r180 top locked
R20 "220K" Res-0402 1.422,22.459 r270 top locked
R21 "1K" Res-0402 1.689,14.503 r0 top locked
R22 "1K" Res-0402 1.689,16.535 r0 top locked
R23 "220K" Res-0402 10.16,59.868 r90 top locked
R24 "10K" Res-0402 11.811,67.386 r90 top locked
R25 "10K" Res-0402 16.281,66.383 r90 top locked
R26 "1K" Res-0402 16.281,68.135 r270 top locked
R27 "220K" Res-0402 10.16,57.175 r90 top locked
R28 "10K" Res-0402 5.613,67.346 r90 top locked
R29 "10K" Res-0402 10.16,67.386 r270 top locked
R30 "10K" Res-0402 5.613,63.759 r90 top locked
R31 "10K" Res-0402 10.16,63.284 r90 top locked
RV1_Relay0 "ERZ-V07D680" ERZ-V07D680 21.692,5.147 r0 top locked (schematic designator RV1)
RV1_Relay1 "ERZ-V07D680" ERZ-V07D680 31.648,5.147 r0 top locked (schematic designator RV1)
RV1_Relay2 "ERZ-V07D680" ERZ-V07D680 41.478,5.147 r0 top locked (schematic designator RV1)
RV1_Relay3 "ERZ-V07D680" ERZ-V07D680 51.587,5.147 r0 top locked (schematic designator RV1)
RV1_Relay4 "ERZ-V07D680" ERZ-V07D680 61.62,5.147 r0 top locked (schematic designator RV1)
RV1_Relay5 "ERZ-V07D680" ERZ-V07D680 71.577,5.147 r0 top locked (schematic designator RV1)
RV1_Relay6 "ERZ-V07D680" ERZ-V07D680 81.636,5.147 r0 top locked (schematic designator RV1)
SW1 "YTS-B003-2A" YTS-B003-2A -1.803,23.856 r90 top locked
U1 "XC6228D332VR-G" SOT-25-5 91.621,60.465 r0 top locked
U2 "LR1107G-33-AB3-C-R" SOT-89-3 19.673,56.045 r90 top locked
U3 "XC6228D182VR-G" SOT-25-5 85.544,66.103 r180 top locked
U4 "BME680" BME680 9.119,-10.82 r0 top locked
U5 "74LVC138AD,118" 16-SOIC 93.586,45.064 r180 top locked
U6 "74LVC138AD,118" 16-SOIC 84.451,45.064 r180 top locked
U7 "74LVC138AD,118" 16-SOIC 75.374,45.064 r180 top locked
U8 "SN74LV14AD" 14-SOIC 72.494,38.259 r180 top locked
U9 "SN74LV14AD" 14-SOIC 81.571,38.259 r180 top locked
U10 "SN74LV14AD" 14-SOIC 90.706,38.259 r180 top locked
U11 "ULN2003A" SOP-16_150mil 72.444,26.034 r180 top locked
U12 "ULN2003A" SOP-16_150mil 81.521,26.009 r180 top locked
U13_Relay0 "OR-3H7B-TP-G" "SOP-4-1.27mm pitch Body 2.6mm" 24.384,12.193 r90 top (schematic designator U13)
U13_Relay1 "OR-3H7B-TP-G" "SOP-4-1.27mm pitch Body 2.6mm" 34.344,12.193 r90 top (schematic designator U13)
U13_Relay2 "OR-3H7B-TP-G" "SOP-4-1.27mm pitch Body 2.6mm" 44.453,12.193 r90 top (schematic designator U13)
U13_Relay3 "OR-3H7B-TP-G" "SOP-4-1.27mm pitch Body 2.6mm" 54.283,12.193 r90 top (schematic designator U13)
U13_Relay4 "OR-3H7B-TP-G" "SOP-4-1.27mm pitch Body 2.6mm" 64.189,12.193 r90 top (schematic designator U13)
U13_Relay5 "OR-3H7B-TP-G" "SOP-4-1.27mm pitch Body 2.6mm" 73.968,12.193 r90 top (schematic designator U13)
U13_Relay6 "OR-3H7B-TP-G" "SOP-4-1.27mm pitch Body 2.6mm" 84.001,12.193 r90 top (schematic designator U13)
U14 "TXS0108EPWR" TSSOP-20 63.003,64.759 r180 top locked
U15 "ESP32-S3-WROOM-1-N8" "41-SMD Module" 44.869,66.304 r0 top locked
V1 "EZLO_LOGO" "Logo Ezlo_M" 44.756,31.509 r0 top locked

## Footprints (in the part's own frame and the unit in brackets; to place one, negate y for a bottom-side part, rotate by r counter-clockwise, add the part's x,y. Pads: shape width x height; smd on the part's side, far side on the other; paste and mask are expansions set on the pad)
14-SOIC [mm]
  rect 1.55x0.6 smd: 1(-2.7,3.81) 2(-2.7,2.54) 3(-2.7,1.27) 4(-2.7,0) 5(-2.7,-1.27) 6(-2.7,-2.54) 7(-2.7,-3.81) 8(2.7,-3.81) 9(2.7,-2.54) 10(2.7,-1.27) 11(2.7,0) 12(2.7,1.27) 13(2.7,2.54) 14(2.7,3.81)
  silkscreen extent -3.78,-4.37 2.03,4.37, body extent -3,-4.33 3,4.33, height 1.75
16-SOIC [mm]
  rect 1.27x0.76 smd: 1(0,0) 2(0,-1.27) 3(0,-2.54) 4(0,-3.81) 5(0,-5.08) 6(0,-6.35) 7(0,-7.62) 8(0,-8.89) 9(5.72,-8.89) 10(5.72,-7.62) 11(5.72,-6.35) 12(5.72,-5.08) 13(5.72,-3.81) 14(5.72,-2.54) 15(5.72,-1.27) 16(5.72,0)
  silkscreen extent -0.91,-9.45 4.88,0.56, body extent -0.14,-9.4 5.86,0.51, height 1.75
"41-SMD Module" [mm]
  rect 1.5x0.9 smd: 1(-8.75,8.88) 2(-8.75,7.61) 3(-8.75,6.34) 4(-8.75,5.07) 5(-8.75,3.8) 6(-8.75,2.53) 7(-8.75,1.26) 8(-8.75,-0.01) 9(-8.75,-1.28) 10(-8.75,-2.55) 11(-8.75,-3.82) 12(-8.75,-5.09) 13(-8.75,-6.36) 14(-8.75,-7.63) 27(8.75,-7.63) 28(8.75,-6.36) 29(8.75,-5.09) 30(8.75,-3.82) 31(8.75,-2.55) 32(8.75,-1.28) 33(8.75,-0.01) 34(8.75,1.26) 35(8.75,2.53) 36(8.75,3.8) 37(8.75,5.07) 38(8.75,6.34) 39(8.75,7.61) 40(8.75,8.88)
  rect 0.9x1.5 smd: 15(-6.98,-8.88) 16(-5.71,-8.88) 17(-4.44,-8.88) 18(-3.17,-8.88) 19(-1.9,-8.88) 20(-0.63,-8.88) 21(0.64,-8.88) 22(1.91,-8.88) 23(3.18,-8.88) 24(4.45,-8.88) 25(5.72,-8.88) 26(6.99,-8.88)
  rect 3.7x3.7 smd: 41(-1.5,1.26)
  Keep-Out Layer region: -9.042,10.287 9.042,10.287 9.042,16.383 -9.042,16.383
  silkscreen extent -9.8,-9.2 9.09,16.43, body extent -9.01,-9.14 9.01,16.37, height 3.16
20021121-00010C4LF_ [mm]
  rect 0.76x2.4 smd: 1(-2.54,-1.95) 2(-2.54,1.95) 3(-1.27,-1.95) 4(-1.27,1.95) 5(0,-1.95) 6(0,1.95) 7(1.27,-1.95) 8(1.27,1.95) 9(2.54,-1.95) 10(2.54,1.95)
  silkscreen extent -3.43,-2.08 3.23,1.22, body extent -3.17,-2.78 3.18,2.72, height 4.5
ABS [mm]
  rect 1.5x0.9 smd: 1(-2.86,2.05) 2(-2.86,-2.05) 3(2.86,-2.05) 4(2.86,2.05)
  silkscreen extent -3.94,-2.5 2.2,2.5, body extent -3.22,-2.5 3.22,2.5, height 1.6
AFC01-S10FCC-00 [mm]
  rect 0.3x1.3 smd: 1(-2.25,1.34) 2(-1.75,1.34) 3(-1.25,1.34) 4(-0.75,1.34) 5(-0.25,1.34) 6(0.25,1.34) 7(0.75,1.34) 8(1.25,1.34) 9(1.75,1.34) 10(2.25,1.34)
  rect 2x1.6 smd: MP1(-3.95,-1.34) MP2(3.95,-1.34)
  silkscreen extent -4.65,-3.4 4.65,1.91, body extent -5.22,-3.35 5.22,1.76, height 2.05
BME680 [mm]
  rect 0.6x0.6 smd: 1(1.2,1.2) 2(1.2,0.4) 3(1.2,-0.4) 4(1.2,-1.2) 5(-1.2,-1.2) 6(-1.2,-0.4) 7(-1.2,0.4) 8(-1.2,1.2)
  silkscreen extent -0.64,-1.55 1.85,1.55, body extent -1.5,-1.5 1.5,1.5, height 1
Cap-0402 [mil]
  rect 18x25 smd mask+2.36: 1(-18.5,0) 2(18.5,0)
  silkscreen extent -31,-16 31,16, body extent -20,-10 20,10, height 19
Cap-0603 [mil]
  rect 30x35 smd mask+2.36: 1(-30,0) 2(30,0)
  silkscreen extent -49,-21 49,21, body extent -32,-16 31,16, height 34
Cap-1206 [mil] "SMD 1206"
  rect 60x70 smd: 1(-50,0) 2(50,0)
  silkscreen extent -84,-39 84,39, body extent -63,-31 63,32, height 39
Clamp-Terminal-A [mm]
  rect 2.8x2.8 hole 1.6: 1(0,0)
  round 2.8 hole 1.6: 2(5,0) 3(10,0) 4(15,0) 5(20,0)
  silkscreen extent -2.75,-1.75 22.75,1.75
Clamp-Terminal-B. [mm]
  rect 2.8x2.8 hole 1.6: 1(-10,0)
  round 2.8 hole 1.6: 2(-5,0) 3(0,0) 4(5,0) 5(10,0)
  silkscreen extent -12.75,-1.75 12.75,1.75
EA2-3TNU [mm]
  rect 1.9x1.9 hole 0.82: 1(3.81,5.08)
  round 1.9 hole 0.82: 2(3.81,2.54) 3(3.81,0) 4(3.81,-2.54) 5(3.81,-5.08) 6(-3.81,-5.08) 7(-3.81,-2.54) 8(-3.81,0) 9(-3.81,2.54) 10(-3.81,5.08)
  silkscreen extent -4.62,-7.14 5.08,7.14, body extent -4.63,-7.1 4.57,7.1, height 5.05
ERZ-V07D680 [mm]
  rect 1.8x1.8 hole 0.8: 1(-2.54,1)
  round 1.8 hole 0.8: 2(2.54,-1)
  silkscreen extent -4.29,-2.64 4.29,2.67, body extent -4.25,-2.59 4.25,2.61, height 13.25
"Fuse 1206 (3216 Metric)" [mm] "0.126\" L x 0.062\" W x 0.026\" H (3.20mm x 1.58mm x 0.65mm)"
  rect 1.06x1.82 smd: 1(-1.528,0) 2(1.528,0)
  silkscreen extent -0.68,-0.85 0.68,0.85, body extent -1.6,-0.79 1.6,0.79, height 0.85
Fuse-0805 [mm]
  rect 1x1.7 smd: 1(-1.1,0) 2(1.1,0)
  silkscreen extent -0.41,-0.81 0.41,0.81, body extent -1.1,-0.75 1.1,0.75, height 1.24
IND-0402 [mm]
  rect 0.4x0.6 smd: 1(-0.35,0) 2(0.35,0)
  silkscreen extent -0.71,-0.46 0.71,0.46, body extent -0.5,-0.25 0.5,0.25, height 0.25
"IND-0603 (1608 Metric)" [mm] "0.063\" L x 0.032\" W (1.60mm x 0.80mm)"
  rect 0.6x0.8 smd: 1(-0.7,0) 2(0.7,0)
  silkscreen extent -0.2,-0.46 0.23,0.46, body extent -0.8,-0.4 0.8,0.4, height 0.78
"IND-1008 (2520 Metric)" [mm]
  rect 0.65x2.2 smd: 1(-0.95,0) 2(0.95,0)
  silkscreen extent -0.41,-1.04 0.41,1.04, body extent -1.25,-1 1.25,1, height 1.2
IND-1206 [mm]
  rect 1.4x1.82 smd: 1(-1.36,0) 2(1.36,0)
  silkscreen extent -0.34,-0.85 0.34,0.85, body extent -1.6,-0.8 1.6,0.8, height 1.3
LED-0603 [mm]
  rect 0.5x1 smd: 1(-0.75,0) 2(0.75,0)
  silkscreen extent -1.12,-0.66 1.75,0.66, body extent -0.82,-0.37 0.82,0.36, height 0.68
"Logo Ezlo_M" [mm]
  silkscreen extent -5.04,-1.34 4.65,2.74
Res-0402 [mil]
  rect 18x25 smd mask+2.17: 1(-18.5,0) 2(18.5,0)
  silkscreen extent -32,-17 32,16, body extent -23,-11 23,11, height 16
Res-1206 [mil]
  rect 60x70 smd: 1(-50,0) 2(50,0)
  silkscreen extent -84,-39 84,39, body extent -63,-31 63,32, height 39
SK6812-EC20 [mm]
  rect 0.8x0.7 smd: 1(0.65,-0.6) 2(0.65,0.6) 3(-0.65,0.6) 4(-0.65,-0.6)
  silkscreen extent -1,-1 1.35,1, body extent -1,-1 1,1, height 0.65
SM10B-SRSS-TB(LF)(SN) [mm]
  rect 0.6x1.55 smd paste+0: 1(-4.5,1.938) 2(-3.5,1.938) 3(-2.5,1.938) 4(-1.5,1.938) 5(-0.5,1.938) 6(0.5,1.938) 7(1.5,1.938) 8(2.5,1.938) 9(3.5,1.938) 10(4.5,1.938)
  rect 1.2x1.8 smd paste+0: MP1(-5.8,-1.937) MP2(5.8,-1.937)
  silkscreen extent -6,-2.64 6,2.13, body extent -5.99,-2.61 6.01,2.34, height 2.96
"SOP-4-1.27mm pitch Body 2.6mm" [mm]
  rect 1.5x0.8 smd: 1(-3.125,0.635) 2(-3.125,-0.635) 3(3.125,-0.635) 4(3.125,0.635) 4(3.125,0.635)
  silkscreen extent -4.17,-1.45 2.08,1.45, body extent -3.5,-1.4 3.5,1.4, height 2.1
SOP-16_150mil [mm]
  rect 1.1x0.6 smd: 1(-2.875,4.445) 2(-2.875,3.175) 3(-2.875,1.905) 4(-2.875,0.635) 5(-2.875,-0.635) 6(-2.875,-1.905) 7(-2.875,-3.175) 8(-2.875,-4.445) 9(2.875,-4.445) 10(2.875,-3.175) 11(2.875,-1.905) 12(2.875,-0.635) 13(2.875,0.635) 14(2.875,1.905) 15(2.875,3.175) 16(2.875,4.445)
  silkscreen extent -3.71,-5.03 1.91,5.03, body extent -3.04,-5 3.04,5, height 1.62
Sot-23 [mm] "TRANS NPN 40V 0.6A SOT23"
  rect 0.82x0.92 smd: 1(-0.95,-1) 2(0.95,-1) 3(0,1)
  silkscreen extent -1.68,-1.3 1.55,0.81, body extent -1.5,-1.25 1.5,1.25, height 1.05
SOT-25-5 [mm]
  rect 1x0.7 smd: 1(-1.2,0.95) 2(-1.2,0) 3(-1.2,-0.95) 4(1.2,-0.95) 5(1.2,0.95)
  silkscreen extent -1.98,-1.55 0.76,1.55, body extent -1.19,-1.5 1.21,1.5, height 1.1
SOT-89-3 [mm]
  rect 0.58x1.73 smd: 1(-1.5,-1.132) 2(0,-1.132) 3(1.5,-1.132)
  rect 1.933x3.03 smd: 2(0,1.132)
  silkscreen extent -2.31,-1.27 2.31,1.73, body extent -2.25,-1.84 2.25,2.41, height 1.54
SOT-143-4_ [mm]
  rect 1.4x1.1 smd: 1(0,0)
  rect 1.4x0.8 smd: 2(0,-1.7) 3(2.2,-1.7) 4(2.2,0.2)
  silkscreen extent -0.99,-2.27 1.76,0.77, body extent -0.08,-2.21 2.29,0.71, height 1.22
Test-point [mil]
  oct 60x60 smd: 1(0,0)
  silkscreen extent -37,-37 37,37
TSSOP-20 [mm]
  rect 1.26x0.36 smd: 1(-2.9,2.925) 2(-2.9,2.275) 3(-2.9,1.625) 4(-2.9,0.975) 5(-2.9,0.325) 6(-2.9,-0.325) 7(-2.9,-0.975) 8(-2.9,-1.625) 9(-2.9,-2.275) 10(-2.9,-2.925) 11(2.9,-2.925) 12(2.9,-2.275) 13(2.9,-1.625) 14(2.9,-0.975) 15(2.9,-0.325) 16(2.9,0.325) 17(2.9,0.975) 18(2.9,1.625) 19(2.9,2.275) 20(2.9,2.925)
  silkscreen extent -3.82,-3.35 1.93,3.35, body extent -3.3,-3.3 3.3,3.3, height 1.09
TYPE-C-31-M-12_ [mm]
  rect 0.6x1.2 smd: A1/B12(0,0) A4/B9(0.8,0) B1/A12(6.4,0) B4/A9(5.6,0)
  rect 0.3x1.2 smd: A5(1.95,0) A6(2.95,0) A7(3.45,0) A8(4.45,0) B5(4.95,0) B6(3.95,0) B7(2.45,0) B8(1.45,0)
  round 0 hole 0.62 unplated: MH(0.31,-1.07) MH(6.09,-1.07)
  oval 0.9x2 hole 0.6 slot 1.7 at 90 deg: S1(7.525,-0.57) S4(-1.125,-0.57)
  oval 0.9x1.7 hole 0.6 slot 1.4 at 90 deg: S2(7.525,-4.75) S3(-1.125,-4.75)
  silkscreen extent -1.3,-5.94 7.7,-1.93, body extent -1.27,-7.32 7.67,0.58, height 3.31
UCD1A101MCL1GS [mm]
  rect 2.8x0.9 smd: 1(-2.3,0) 2(2.3,0)
  silkscreen extent -4.12,-3.3 3.3,3.3, body extent -3.5,-3.32 3.5,3.28, height 5.8
"Voltlink Target" [mm]
  rect 0.5x1.6 smd: 1(-2.5,-1.262) 2(-1.5,-1.262) 3(-0.5,-1.262) 4(0.5,-1.262) 5(1.5,-1.262) 6(2.5,-1.262)
  rect 1.2x1.8 smd: MP1(-3.8,1.262) MP2(3.8,1.262)
  silkscreen extent -4.06,-1.68 4.06,2.17, body extent -4,-1.49 4,2.11, height 4.25
YTS-B003-2A [mm]
  rect 1.2x1.2 smd: 1(-2.1,-1.125) 2(2.1,-1.125)
  rect 1.5x0.7 smd: 3(3.45,1.125) 4(-3.45,1.125)
  round 1.5 hole 0.8: 5(3.75,0.475) 6(-3.75,0.475)
  round 0 hole 0.9 unplated: MH0(-1.15,0.175) MH1(1.15,0.175)
  silkscreen extent -3.68,-1.68 3.66,1.6, body extent -3.7,-1.37 3.7,2.36, height 3.59

## Part data
BR1_Relay0 BR1_Relay1 BR1_Relay2 BR1_Relay3 BR1_Relay4 BR1_Relay5 BR1_Relay6: "5uA@1kV 1V@0.4A 1A 1kV -55℃~+150℃@(Tj) ABS Bridge Rectifiers ROHS", LCSC Part Number=C3014049, Manufacturer=FOSAN, Package=ABS, ComponentLink1Description=LCSC, ComponentLink1URL=https://www.lcsc.com/product-detail/Bridge-Rectifiers_FOSAN-ABS10_C3014049.html, Item Type="Bridge Rectifier", Manufacturer Part Number=ABS10
C1 C3 C6 C16 C20: library part CC0402MRX5R6BB106, "CAP CER 10UF 10V X5R 0402", Case Code (Imperial)=0402, Case Code (Metric)=1005, LCSC Part Number=C962143, Manufacturer=Yageo, Max Operating Temperature=85°C, Min Operating Temperature=-55°C, Supplier Part Number 1=6097631, Tolerance=20%, Voltage Rating=10V, Capacitance=10uF, Case/Package=0402, Category="Ceramic Capacitors", ComponentLink1Description=http://www.yageo.com/documents/recent/UPY-GPHC_X5R_4V-to-50V_25.pdf?src-supplier=Digi-Key, ComponentLink1URL=http://www.yageo.com/documents/recent/UPY-GPHC_X5R_4V-to-50V_25.pdf?src-supplier=Digi-Key, Item Type=Capacitor, Manufacturer Part Number=CC0402MRX5R6BB106, Mount="Surface Mount", Packaging="Tape and Reel", Pricing 1="10000=0.02650, 20000=0.02590, 30000=0.02550, 40000=0.02530, 50000=0.02450 (USD)", RoHS=Yes, RoHS Compliant=Yes, Stock 1=80000, Supplier 1="Future Electronics"
C2 C5 C7 C8 C10 C12 C14 C15 C19 C21 C22 C23 C24 C25 C26 C27 C28 C29 C30 C32 C33 C35 C37 C38 C39 C40 C41: library part CC0402KRX5R8BB104, "CAP CER 0.1UF 25V X5R 0402", Case Code (Imperial)=0402, Case Code (Metric)=1005, Dielectric=X5R, LCSC Part Number=C106256, Manufacturer=Yageo, Max Operating Temperature=85°C, Min Operating Temperature=-55°C, Resistor Type=Ceramic, Supplier Part Number 1=311-1697-1-ND, Tolerance=10%, Voltage Rating=25V, Capacitance=100nF, Case/Package=0402, Category="Ceramic Capacitors", ComponentLink1Description=http://www.mouser.com/ds/2/447/UPY-GPHC_X5R_4V-to-50V_25-1131599.pdf?src-supplier=Mouser, ComponentLink1URL=http://www.mouser.com/ds/2/447/UPY-GPHC_X5R_4V-to-50V_25-1131599.pdf?src-supplier=Mouser, ComponentLink2Description=http://www.yageo.com/documents/recent/UPY-GPHC_X5R_4V-to-50V-16.pdf?src-supplier=Future+Electronics, ComponentLink2URL=http://www.yageo.com/documents/recent/UPY-GPHC_X5R_4V-to-50V-16.pdf?src-supplier=Future+Electronics, ComponentLink3Description=http://www.yageo.com/documents/recent/UPY-GPHC_X5R_4V-to-50V_25.pdf?src-supplier=Digi-Key, ComponentLink3URL=http://www.yageo.com/documents/recent/UPY-GPHC_X5R_4V-to-50V_25.pdf?src-supplier=Digi-Key, Depth=0.5mm, Halogen Free="Halogen Free", Item Type=Capacitor, Lead Free="Lead Free", Length=0.039inch, Manufacturer Part Number=CC0402KRX5R8BB104, Mount="Surface Mount", Packaging="Tape and Reel", Pricing 1="1=0.10000, 10=0.03800, 50=0.02100, 100=0.01710, 500=0.01224, 1000=0.00961, 2500=0.00874, 5000=0.00804 (USD)", RoHS=Yes, RoHS Compliant=Yes, Series=CC, Stock 1=4598218, Supplier 1=Digi-Key, Thickness=0.022inch, Voltage Rating (DC)=25V, Width=0.02inch
C4: library part CC1206GRNPO9BN472, "CAP CER 4700PF 50V C0G/NPO 1206", Case Code (Imperial)=1206, Case Code (Metric)=3216, Dielectric=C0G, Manufacturer=Yageo, Max Operating Temperature=125°C, Min Operating Temperature=-55°C, Package Quantity=4000, Resistor Type=Ceramic, Supplier Part Number 1=603-C1206GRNPO9BN472, Tolerance=2%, Voltage Rating=50V, Capacitance=4.7nF, Case/Package=1206, Category="Ceramic Capacitors", ComponentLink1Description=https://datasheet.ciiva.com/11587/upy-gp-np0-16v-to-50v-8-11587271.pdf?src-supplier=Avnet, ComponentLink1URL=https://datasheet.ciiva.com/11587/upy-gp-np0-16v-to-50v-8-11587271.pdf?src-supplier=Avnet, ComponentLink2Description=https://datasheet.ciiva.com/13386/upy-gp-np0-16v-to-50v-8-13386316.pdf?src-supplier=Mouser, ComponentLink2URL=https://datasheet.ciiva.com/13386/upy-gp-np0-16v-to-50v-8-13386316.pdf?src-supplier=Mouser, Depth=1.6mm, Height=0.85mm, Length=3.2mm, Manufacturer Part Number=CC1206GRNPO9BN472, Mount="Surface Mount", Packaging="Tape and Reel", Pricing 1="1=0.41000, 10=0.28600, 50=0.28600, 100=0.17200, 1000=0.10900, 10000=0.09100 (USD)", Radiation Hardening=No, RoHS=Yes, RoHS Compliant=Yes, Series=CC, Supplier 1=Mouser, Termination=SMD/SMT, Thickness=0.037inch, Voltage Rating (DC)=50V, Width=0.063inch
C9 C11: library part CC0402KRX5R8BB103, "CAP CER 10000PF 25V X5R 0402", LCSC Part Number=C576726, Manufacturer=Yageo, Supplier Part Number 1=2101932, Category="Ceramic Capacitors", ComponentLink1Description=LCSC, ComponentLink1URL=https://www.lcsc.com/product-detail/Multilayer-Ceramic-Capacitors-MLCC-SMD-SMT_YAGEO-CC0402KRX5R8BB103_C576726.html, Item Type=Capacitor, Manufacturer Part Number=CC0402KRX5R8BB103, Pricing 1="10000=0.00290, 40000=0.00270, 150000=0.00260, 250000=0.00250, 500000=0.00240 (USD)", RoHS=Yes, RoHS Compliant=Yes, Stock 1=140000, Supplier 1="Future Electronics"
C13: library part CC0603KRX5R7BB106, "CAP CER 10UF 16V X5R 0603", Case Code (Imperial)=0603, Case Code (Metric)=1608, LCSC Part Number=C2936601, Manufacturer=Yageo, Max Operating Temperature=85°C, Min Operating Temperature=-55°C, Supplier Part Number 1=311-3486-1-ND, Tolerance=10%, Voltage Rating=16V, Capacitance=10uF, Case/Package=0603, Category="Ceramic Capacitors", ComponentLink1Description=http://www.yageo.com/documents/recent/UPY-GPHC_X5R_4V-to-50V_25.pdf?src-supplier=Digi-Key, ComponentLink1URL=http://www.yageo.com/documents/recent/UPY-GPHC_X5R_4V-to-50V_25.pdf?src-supplier=Digi-Key, Item Type=Capacitor, Manufacturer Part Number=CC0603KRX5R7BB106, Mount="Surface Mount", Packaging="Cut Tape", Pricing 1="1=0.68000, 10=0.48000, 50=0.36300, 100=0.31610, 500=0.23416, 1000=0.19903 (USD)", RoHS=Yes, RoHS Compliant=Yes, Stock 1=240725, Supplier 1=Digi-Key
C17 C18: library part UCD1A101MCL1GS, "CAP ALUM 100UF 20% 10V SMD", Case/Package=Radial, LCSC Part Number=C340720, Leakage Current=10uA, Manufacturer=Nichicon, Max Operating Temperature=105°C, Min Operating Temperature=-55°C, Package Quantity=1000, Ripple Current=240mA, Supplier Part Number 1=493-14563-1-ND, Tolerance=20%, Voltage=10V, Capacitance=100uF, Category="Aluminum Electrolytic Capacitors", ComponentLink1Description=https://datasheet.ciiva.com/11776/0900766b80ebdadd-11776792.pdf?src-supplier=RSComponents, ComponentLink1URL=https://datasheet.ciiva.com/11776/0900766b80ebdadd-11776792.pdf?src-supplier=RSComponents, ComponentLink2Description=https://datasheet.ciiva.com/111/e-cd-111628.pdf?src-supplier=Digi-Key, ComponentLink2URL=https://datasheet.ciiva.com/111/e-cd-111628.pdf?src-supplier=Digi-Key, ComponentLink3Description=https://datasheet.ciiva.com/11686/e-cd-11686168.pdf?src-supplier=Avnet, ComponentLink3URL=https://datasheet.ciiva.com/11686/e-cd-11686168.pdf?src-supplier=Avnet, Construction=Cylindrical, Diameter=6.3mm, Dissipation Factor=0.19%, Height=5.8mm, Height - Seated (Max)=0.24inch, Impedance=360mR, Item Type=Capacitor, Length=5.8mm, Life (Hours)=2000Hour, Manufacturer Part Number=UCD1A101MCL1GS, Mount="Surface Mount", Packaging="Tape and Reel", Polarity=Polar, Pricing 1="1=0.51000, 10=0.35900, 50=0.27160, 100=0.23660, 500=0.17526 (USD)", Radiation Hardening=No, RoHS=Yes, RoHS Compliant=Yes, Series=CD, Stock 1=6029, Supplier 1=Digi-Key, Termination=SMD/SMT, Voltage Rating=10V, Voltage Rating (DC)=10V
C31_Relay0 C31_Relay1 C31_Relay2 C31_Relay3 C31_Relay4 C31_Relay5 C31_Relay6: library part 1206B224K500NT, "50V 220nF X7R ±10% 1206 Multilayer Ceramic Capacitors MLCC - SMD/SMT ROHS", LCSC Part Number=C1857, Manufacturer=FH, Package=1206, ComponentLink1Description=LCSC, ComponentLink1URL=https://www.lcsc.com/product-detail/Multilayer-Ceramic-Capacitors-MLCC-SMD-SMT_FH-Guangdong-Fenghua-Advanced-Tech-1206B224K500NT_C1857.html, Item Type=Capacitor, Manufacturer Part Number=1206B224K500NT
C34: library part CC0603MRX5R5BB226, "CAP CER 22UF 6.3V X5R 0603", Case Code (Imperial)=0603, Case Code (Metric)=1608, Dielectric=X5R, LCSC Part Number=C109448, Manufacturer=Yageo, Max Operating Temperature=85°C, Min Operating Temperature=-55°C, Package Quantity=4000, Resistor Type=Ceramic, Supplier Part Number 1=603-CC603MRX5R5BB226, Tolerance=20%, Voltage Rating=6.3V, Capacitance=22uF, Case/Package=0603, Category="Ceramic Capacitors", ComponentLink1Description=http://www.mouser.com/ds/2/447/Yageo_UPY-GP_NP0_16V-to-50V_9-358835.pdf?src-supplier=Mouser, ComponentLink1URL=http://www.mouser.com/ds/2/447/Yageo_UPY-GP_NP0_16V-to-50V_9-358835.pdf?src-supplier=Mouser, ComponentLink2Description=http://www.yageo.com/documents/recent/UPY-GPHC_X5R_4V-to-50V_25.pdf?src-supplier=Digi-Key, ComponentLink2URL=http://www.yageo.com/documents/recent/UPY-GPHC_X5R_4V-to-50V_25.pdf?src-supplier=Digi-Key, Depth=0.8mm, Halogen Free="Halogen Free", Lead Free="Lead Free", Length=0.063inch, Manufacturer Part Number=CC0603MRX5R5BB226, Mount="Surface Mount", Packaging="Tape and Reel", Pricing 1="1=0.33000, 10=0.22500, 50=0.22500, 100=0.12800, 1000=0.07900, 10000=0.06500 (USD)", RoHS=Yes, RoHS Compliant=Yes, Stock 1=3030, Supplier 1=Mouser, Termination=SMD/SMT, Thickness=0.035inch, Voltage Rating (DC)=6.3V, Weight=7.1E-05oz, Width=0.031inch
C36: library part CC0402KRX5R8BB105, "CAP CER 1UF 25V X5R 0402", Case Code (Imperial)=0402, Case Code (Metric)=1005, Dielectric=X5R, LCSC Part Number=C326568, Manufacturer=Yageo, Max Operating Temperature=85°C, Min Operating Temperature=-55°C, Package Quantity=10000, Supplier Part Number 1=603-CC402KRX5R8BB105, Tolerance=10%, Voltage Rating=25V, Capacitance=1uF, Case/Package=0402, Category="Ceramic Capacitors", ComponentLink1Description=http://www.mouser.com/ds/2/447/Yageo_UPY-GP_NP0_16V-to-50V_9-358835.pdf?src-supplier=Mouser, ComponentLink1URL=http://www.mouser.com/ds/2/447/Yageo_UPY-GP_NP0_16V-to-50V_9-358835.pdf?src-supplier=Mouser, ComponentLink2Description=http://www.yageo.com/documents/recent/UPY-GPHC_X5R_4V-to-50V_25.pdf?src-supplier=Digi-Key, ComponentLink2URL=http://www.yageo.com/documents/recent/UPY-GPHC_X5R_4V-to-50V_25.pdf?src-supplier=Digi-Key, ComponentLink3Description=https://4donline.ihs.com/images/VipMasterIC/IC/YAGO/YAGO-S-A0006851646/YAGO-S-A0006851646-1.pdf?hkey=6D3A4C79FDBF58556ACFDE234799DDF0&src-supplier=Newark, ComponentLink3URL=https://4donline.ihs.com/images/VipMasterIC/IC/YAGO/YAGO-S-A0006851646/YAGO-S-A0006851646-1.pdf?hkey=6D3A4C79FDBF58556ACFDE234799DDF0&src-supplier=Newark, Halogen Free="Halogen Free", Lead Free="Lead Free", Length=0.039inch, Manufacturer Part Number=CC0402KRX5R8BB105, Mount="Surface Mount", Packaging="Tape and Reel", Pricing 1="1=0.30000, 10=0.20400, 50=0.20400, 100=0.11600, 1000=0.07200, 10000=0.05900 (USD)", RoHS=Yes, RoHS Compliant=Yes, Stock 1=91975, Supplier 1=Mouser, Termination=SMD/SMT, Thickness=0.022inch, Voltage Rating (DC)=25V, Weight=2.3E-05oz, Width=0.02inch
D1: "ESD Suppressor TVS 5.5V 4-Pin(3+Tab) SOT-143 T/R", Breakdown Voltage=5.5V, Capacitance=30pF, Case/Package=SOT-143, Clamping Voltage=7.8V, Clamping Voltage-Max=8V, LCSC Part Number=C3029025, Leakage Current=100nA, Manufacturer=Littelfuse, Max Operating Temperature=85°C, Max Power Dissipation=225mW, Min Operating Temperature=-40°C, Power Line Protection=No, Resistor Type=Zener, Supplier Part Number 1=F2715CT-ND, Voltage Rating (DC)=5V, Category=Diodes, ComponentLink1Description=https://datasheet.ciiva.com/15143/getdatasheetpartid-116020-15143550.pdf?src-supplier=Verical, ComponentLink1URL=https://datasheet.ciiva.com/15143/getdatasheetpartid-116020-15143550.pdf?src-supplier=Verical, ComponentLink2Description=https://datasheet.ciiva.com/332/sp05xxba-332550.pdf?src-supplier=Digi-Key, ComponentLink2URL=https://datasheet.ciiva.com/332/sp05xxba-332550.pdf?src-supplier=Digi-Key, ComponentLink3Description=https://datasheet.ciiva.com/8062/littefuse-spa-sp050x-8062422.pdf?src-supplier=Element14, ComponentLink3URL=https://datasheet.ciiva.com/8062/littefuse-spa-sp050x-8062422.pdf?src-supplier=Element14, ComponentLink4Description=https://datasheet.ciiva.com/22697/1911798-22697942.pdf?src-supplier=Element14, ComponentLink4URL=https://datasheet.ciiva.com/22697/1911798-22697942.pdf?src-supplier=Element14, ComponentLink5Description=https://datasheet.ciiva.com/332/sp05xxba-332551.pdf?src-supplier=Digi-Key, ComponentLink5URL=https://datasheet.ciiva.com/332/sp05xxba-332551.pdf?src-supplier=Digi-Key, ComponentLink6Description=https://datasheet.ciiva.com/16449/sp05xxba-16449463.pdf?src-supplier=Future+Electronics, ComponentLink6URL=https://datasheet.ciiva.com/16449/sp05xxba-16449463.pdf?src-supplier=Future+Electronics, ComponentLink7Description=https://datasheet.ciiva.com/332/sp05xxba-332552.pdf?src-supplier=Digi-Key, ComponentLink7URL=https://datasheet.ciiva.com/332/sp05xxba-332552.pdf?src-supplier=Digi-Key, ComponentLink8Description=https://datasheet.ciiva.com/4509/sp05x-leadfree-4509162.pdf?src-supplier=Mouser, ComponentLink8URL=https://datasheet.ciiva.com/4509/sp05x-leadfree-4509162.pdf?src-supplier=Mouser, ComponentLink9Description=https://datasheet.ciiva.com/7650/526672-7650894.pdf?src-supplier=Element14, ComponentLink9URL=https://datasheet.ciiva.com/7650/526672-7650894.pdf?src-supplier=Element14, Depth=1.4mm, Diode Type=Avalanche, Direction=Unidirectional, Element Configuration="Common Anode", ESD Protection=Yes, Height=1.05mm, Lead Free="Lead Free", Length=3.04mm, Manufacturer Part Number=SP0503BAHTG, Max Reverse Leakage Current=100nA, Mount="Surface Mount", Number of Channels=3, Number of Elements=3, Number of Pins=4, Number of Unidirectional Channels=3, Operating Supply Voltage=5.5V, Packaging="Tape and Reel", Peak Pulse Power=225mW, Polarity=Bidirectional,Unidirectional, Power Dissipation=225mW, Pricing 1="1=0.92000, 10=0.81200, 100=0.62260, 500=0.49214, 1000=0.39371 (USD)", Radiation Hardening=No, REACH SVHC="No SVHC", Reverse Standoff Voltage=5.5V, RoHS=Yes, RoHS Compliant=Yes, Series="SP05, SPA®", Stock 1=651, Supplier 1=Digi-Key, Termination=SMD/SMT, Width=1.4mm, Working Voltage=5.5V
F1: "6V 1A 100A 1.95A 300ms 0805 Resettable Fuses ROHS", LCSC Part Number=C369152, Manufacturer="Jinrui Electronic Materials Co.", Package=0805, ComponentLink1Description=LCSC, ComponentLink1URL=https://www.lcsc.com/product-detail/Resettable-Fuses_Jinrui-Electronic-Materials-Co-JK-SMD0805-100_C369152.html, Item Type=Fuse, Manufacturer Part Number=JK-SMD0805-100
F2: "6V 2A 100A 0.8W 3.5A -40℃~+85℃ 0.018Ω 1.5s 0.08Ω 1206 Resettable Fuses ROHS", LCSC Part Number=C2960517, Manufacturer=KAILONG, Package=1206, ComponentLink1Description=LCSC, ComponentLink1URL=https://www.lcsc.com/product-detail/Resettable-Fuses_KAILONG-SMD1206K200SF6V_C2960517.html, Item Type=Fuse, Manufacturer Part Number=SMD1206K200SF6V
FB1: "FERRITE BEAD 120 OHM 0603 1LN", Case Code (Imperial)=0603, Case Code (Metric)=1608, Current Rating=3A, DC Resistance (DCR)=25mR, Frequency=100MHz, LCSC Part Number=C113030, Manufacturer=Murata, Max Operating Temperature=125°C, Min Operating Temperature=-55°C, Package Quantity=1, Tolerance=25%, Case/Package=0603, Category="Ferrite Beads and Chips", ComponentLink1Description=https://datasheet.ciiva.com/1012/l0110s0100blm18s-1012624.pdf?src-supplier=Digi-Key, ComponentLink1URL=https://datasheet.ciiva.com/1012/l0110s0100blm18s-1012624.pdf?src-supplier=Digi-Key, ComponentLink2Description=https://datasheet.ciiva.com/11799/0900766b811b5866-11799181.pdf?src-supplier=RSComponents, ComponentLink2URL=https://datasheet.ciiva.com/11799/0900766b811b5866-11799181.pdf?src-supplier=RSComponents, ComponentLink3Description=https://datasheet.ciiva.com/18093/getdatasheetpartid-295885-18093249.pdf?src-supplier=Verical, ComponentLink3URL=https://datasheet.ciiva.com/18093/getdatasheetpartid-295885-18093249.pdf?src-supplier=Verical, ComponentLink4Description=https://datasheet.ciiva.com/41449/001171723-da-01-en-chip-drossel0603-120r-3000ma-1-6x0-8mm-41449353.pdf?src-supplier=Conrad, ComponentLink4URL=https://datasheet.ciiva.com/41449/001171723-da-01-en-chip-drossel0603-120r-3000ma-1-6x0-8mm-41449353.pdf?src-supplier=Conrad, ComponentLink5Description=https://datasheet.ciiva.com/41449/001172312-da-01-en-drossel-0603-120r-1-6x0-8mm-10000st-41449675.pdf?src-supplier=Conrad, ComponentLink5URL=https://datasheet.ciiva.com/41449/001172312-da-01-en-drossel-0603-120r-1-6x0-8mm-10000st-41449675.pdf?src-supplier=Conrad, ComponentLink6Description=https://datasheet.ciiva.com/8021/5151-8021511.pdf?src-supplier=Element14, ComponentLink6URL=https://datasheet.ciiva.com/8021/5151-8021511.pdf?src-supplier=Element14, ComponentLink7Description=https://datasheet.ciiva.com/8021/5151-8021512.pdf?src-supplier=Element14, ComponentLink7URL=https://datasheet.ciiva.com/8021/5151-8021512.pdf?src-supplier=Element14, ComponentLink8Description=https://datasheet.ciiva.com/14122/blm-series-eng-tds-14122906.pdf?src-supplier=Distrelec, ComponentLink8URL=https://datasheet.ciiva.com/14122/blm-series-eng-tds-14122906.pdf?src-supplier=Distrelec, ComponentLink9Description=https://datasheet.ciiva.com/1012/l0110s0100blm18s-1012623.pdf?src-supplier=Digi-Key, ComponentLink9URL=https://datasheet.ciiva.com/1012/l0110s0100blm18s-1012623.pdf?src-supplier=Digi-Key, ComponentLink10Description=https://datasheet.ciiva.com/1012/l0110s0100blm18s-1012625.pdf?src-supplier=Digi-Key, ComponentLink10URL=https://datasheet.ciiva.com/1012/l0110s0100blm18s-1012625.pdf?src-supplier=Digi-Key, ComponentLink11Description=https://datasheet.ciiva.com/16395/l0110s0100blm18s-16395498.pdf?src-supplier=Future+Electronics, ComponentLink11URL=https://datasheet.ciiva.com/16395/l0110s0100blm18s-16395498.pdf?src-supplier=Future+Electronics, Core Material=Ferrite, DC Resistance-Max=25mR, Depth=0.8mm, Height=0.8mm, Impedance=120R, Item Type="Ferrite Bead", Lead Free="Lead Free", Length=1.6mm, Manufacturer Part Number=BLM18SG121TN1D, Material=Steel,Ferrite, Max Current Rating=3A, Max DC Current=3A, Number of Circuits=1, Number of Lines=1, Number of Pins=2, Packaging="Tape and Reel", Pricing 1="1=0.12640, 10=0.08350, 25=0.07210, 100=0.05150, 250=0.04730, 500=0.04110, 1000=0.03420, 3000=0.03360, 6000=0.03320, 15000=0.03270, 30000=0.03200, 75000=0.03150 (USD)", Reach SVHC Compliant=Yes, RoHS=Yes, RoHS Compliant=Yes, Series=BLM18S, Shielding=Unshielded, Stock 1=82612, Supplier 1="Arrow Electronics", Supplier Part Number 1=BLM18SG121TN1D, Termination=SMD/SMT, Test Frequency=100MHz, Width=0.8mm
FB2: library part BLM31PG121SN1L, "FERRITE BEAD 120 OHM 1206 1LN", Case Code (Imperial)=1206, Case Code (Metric)=3216, Current Rating=3.5A, DC Current=3A, DC Resistance (DCR)=20mR, LCSC Part Number=C85841, Manufacturer=Murata, Max Operating Temperature=125°C, Min Operating Temperature=-55°C, Package Quantity=3000, Tolerance=25%, Case/Package=1206, Category="Ferrite Beads and Chips", ComponentLink1Description=https://datasheet.ciiva.com/19460/1845419-19460234.pdf?src-supplier=Jameco, ComponentLink1URL=https://datasheet.ciiva.com/19460/1845419-19460234.pdf?src-supplier=Jameco, ComponentLink2Description=https://datasheet.ciiva.com/1012/l0132s0193blm31p-1012992.pdf?src-supplier=Digi-Key, ComponentLink2URL=https://datasheet.ciiva.com/1012/l0132s0193blm31p-1012992.pdf?src-supplier=Digi-Key, ComponentLink3Description=https://datasheet.ciiva.com/11799/0900766b811b5866-11799444.pdf?src-supplier=RSComponents, ComponentLink3URL=https://datasheet.ciiva.com/11799/0900766b811b5866-11799444.pdf?src-supplier=RSComponents, ComponentLink4Description=https://datasheet.ciiva.com/3081/l0110s0100blm31p-3081665.pdf?src-supplier=Avnet, ComponentLink4URL=https://datasheet.ciiva.com/3081/l0110s0100blm31p-3081665.pdf?src-supplier=Avnet, ComponentLink5Description=https://datasheet.ciiva.com/41449/001172383-da-01-en-drossel-1206-120r-3-2x1-60mm-3000st-41449554.pdf?src-supplier=Conrad, ComponentLink5URL=https://datasheet.ciiva.com/41449/001172383-da-01-en-drossel-1206-120r-3-2x1-60mm-3000st-41449554.pdf?src-supplier=Conrad, ComponentLink6Description=https://datasheet.ciiva.com/29348/442557-da-01-en-chip-drossel-1206-120r-3000ma-3-2x1-60mm-29348014.pdf?src-supplier=Conrad, ComponentLink6URL=https://datasheet.ciiva.com/29348/442557-da-01-en-chip-drossel-1206-120r-3000ma-3-2x1-60mm-29348014.pdf?src-supplier=Conrad, ComponentLink7Description=https://datasheet.ciiva.com/14122/apblm31p-data-e-14122856.pdf?src-supplier=Distrelec, ComponentLink7URL=https://datasheet.ciiva.com/14122/apblm31p-data-e-14122856.pdf?src-supplier=Distrelec, ComponentLink8Description=https://datasheet.ciiva.com/48436/blm31pg121sn1l-eng-tds-48436731.pdf?src-supplier=Distrelec, ComponentLink8URL=https://datasheet.ciiva.com/48436/blm31pg121sn1l-eng-tds-48436731.pdf?src-supplier=Distrelec, ComponentLink9Description=https://datasheet.ciiva.com/1012/l0110s0100blm31p-1012991.pdf?src-supplier=Digi-Key, ComponentLink9URL=https://datasheet.ciiva.com/1012/l0110s0100blm31p-1012991.pdf?src-supplier=Digi-Key, ComponentLink10Description=https://datasheet.ciiva.com/1012/l0110s0100blm31p-1012993.pdf?src-supplier=Digi-Key, ComponentLink10URL=https://datasheet.ciiva.com/1012/l0110s0100blm31p-1012993.pdf?src-supplier=Digi-Key, ComponentLink11Description=https://datasheet.ciiva.com/3081/l0110s0100blm31p-3081666.pdf?src-supplier=Avnet, ComponentLink11URL=https://datasheet.ciiva.com/3081/l0110s0100blm31p-3081666.pdf?src-supplier=Avnet, ComponentLink12Description=https://datasheet.ciiva.com/16390/l0110s0100blm31p-16390857.pdf?src-supplier=Future+Electronics, ComponentLink12URL=https://datasheet.ciiva.com/16390/l0110s0100blm31p-16390857.pdf?src-supplier=Future+Electronics, ComponentLink13Description=https://datasheet.ciiva.com/18093/getdatasheetpartid-152966-18093084.pdf?src-supplier=Verical, ComponentLink13URL=https://datasheet.ciiva.com/18093/getdatasheetpartid-152966-18093084.pdf?src-supplier=Verical, Contact Plating=Tin,Matte, Core Material=Ferrite, Depth=1.6mm, Frequency=100MHz, Height=1.1mm, Impedance=120R, Item Type="Ferrite Bead", Lead Free="Lead Free", Length=3.2mm, Manufacturer Part Number=BLM31PG121SN1L, Material=Steel,Ferrite, Max Current Rating=3.5A, Max DC Current=3A, Military Standard=Not, Number of Lines=1, Number of Pins=2, Packaging="Tape and Reel", Pricing 1="3000=0.11563, 6000=0.10938, 12000=0.10313, 18000=0.09688, 24000=0.09063, 30000=0.08438, 300000=0.07813 (USD)", Radiation Hardening=No, RoHS=Yes, RoHS Compliant=Yes, Shielding=Unshielded, Stock 1=290640, Supplier 1=Avnet, Supplier Part Number 1=BLM31PG121SN1L, Termination=SMD/SMT, Test Frequency=100MHz, Width=1.6mm